# Altium PCB HSS_2026_PCB.PcbDoc (part 1 of 3)
Units mil, origin at the board's own origin, x right, y up, seen from the top; angles counter-clockwise.
Board outline 3937.01 x 3937.01 mil, 4 copper layers (SIG_1/POW, GND, PWR, SIG_2/GND), stack 22.334 mil thick; 289 components, 169 nets, 827 pads, 358 vias.
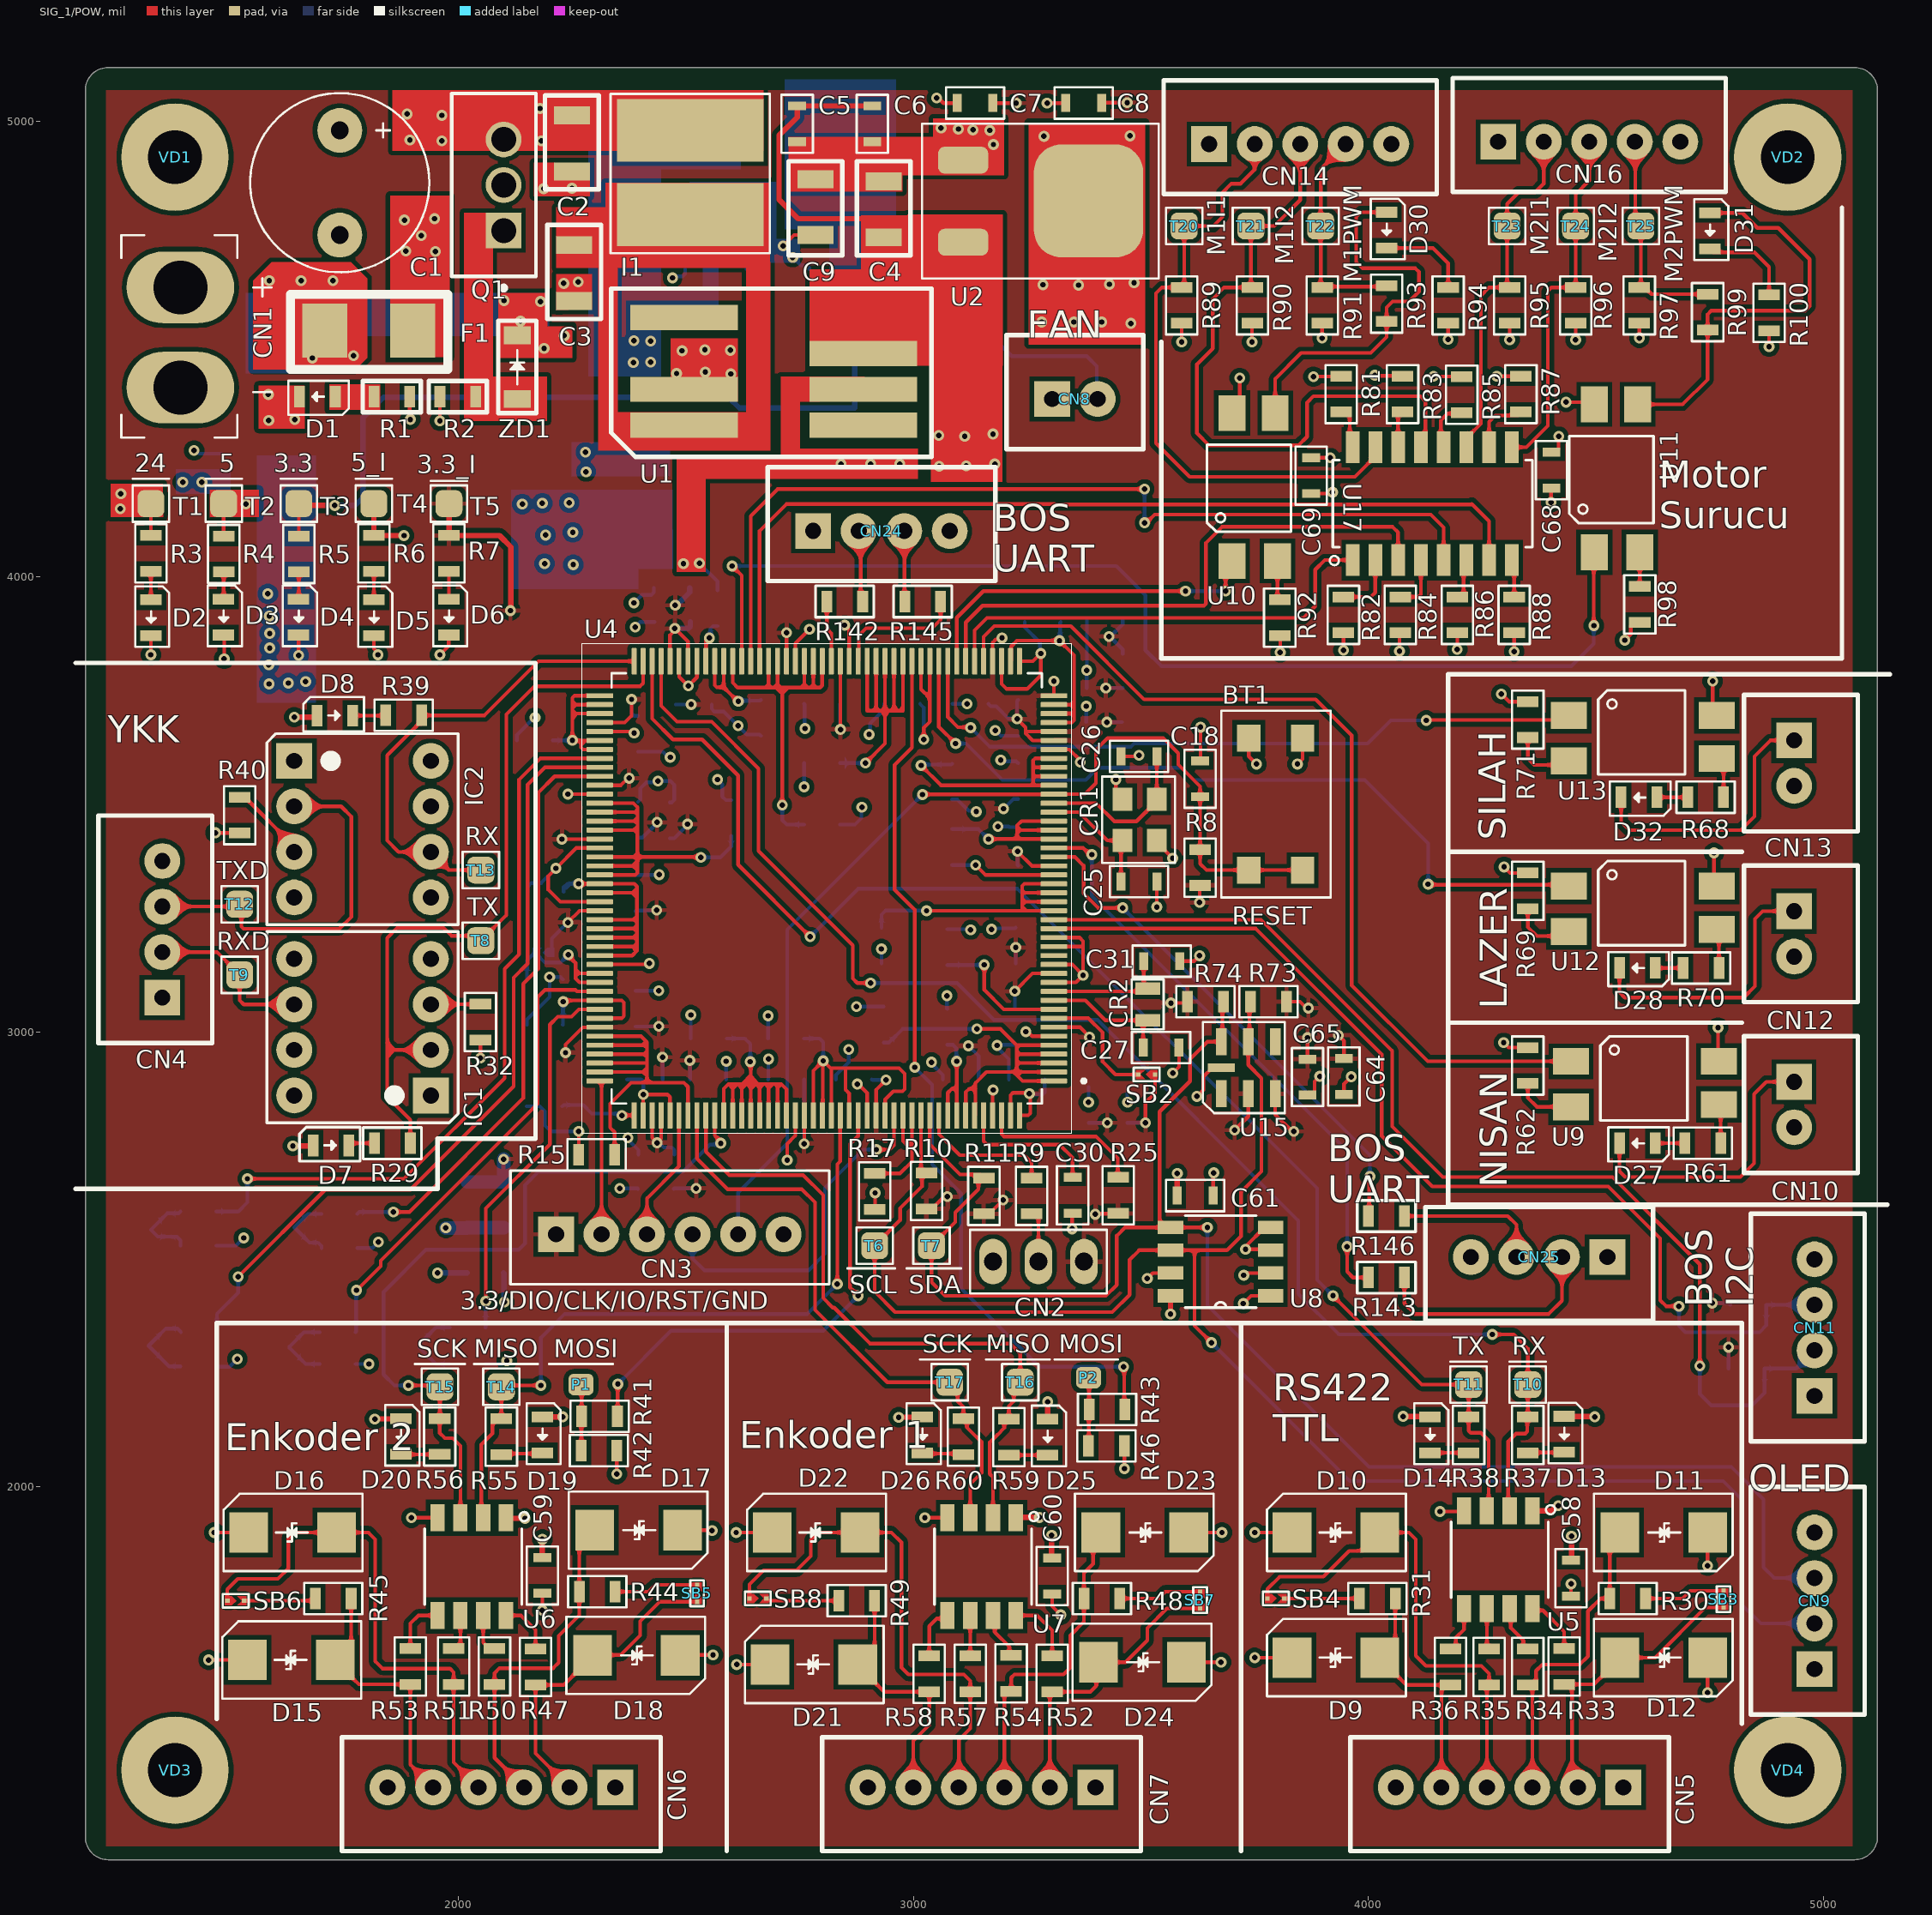
[diagram p0: SIG_1/POW view]
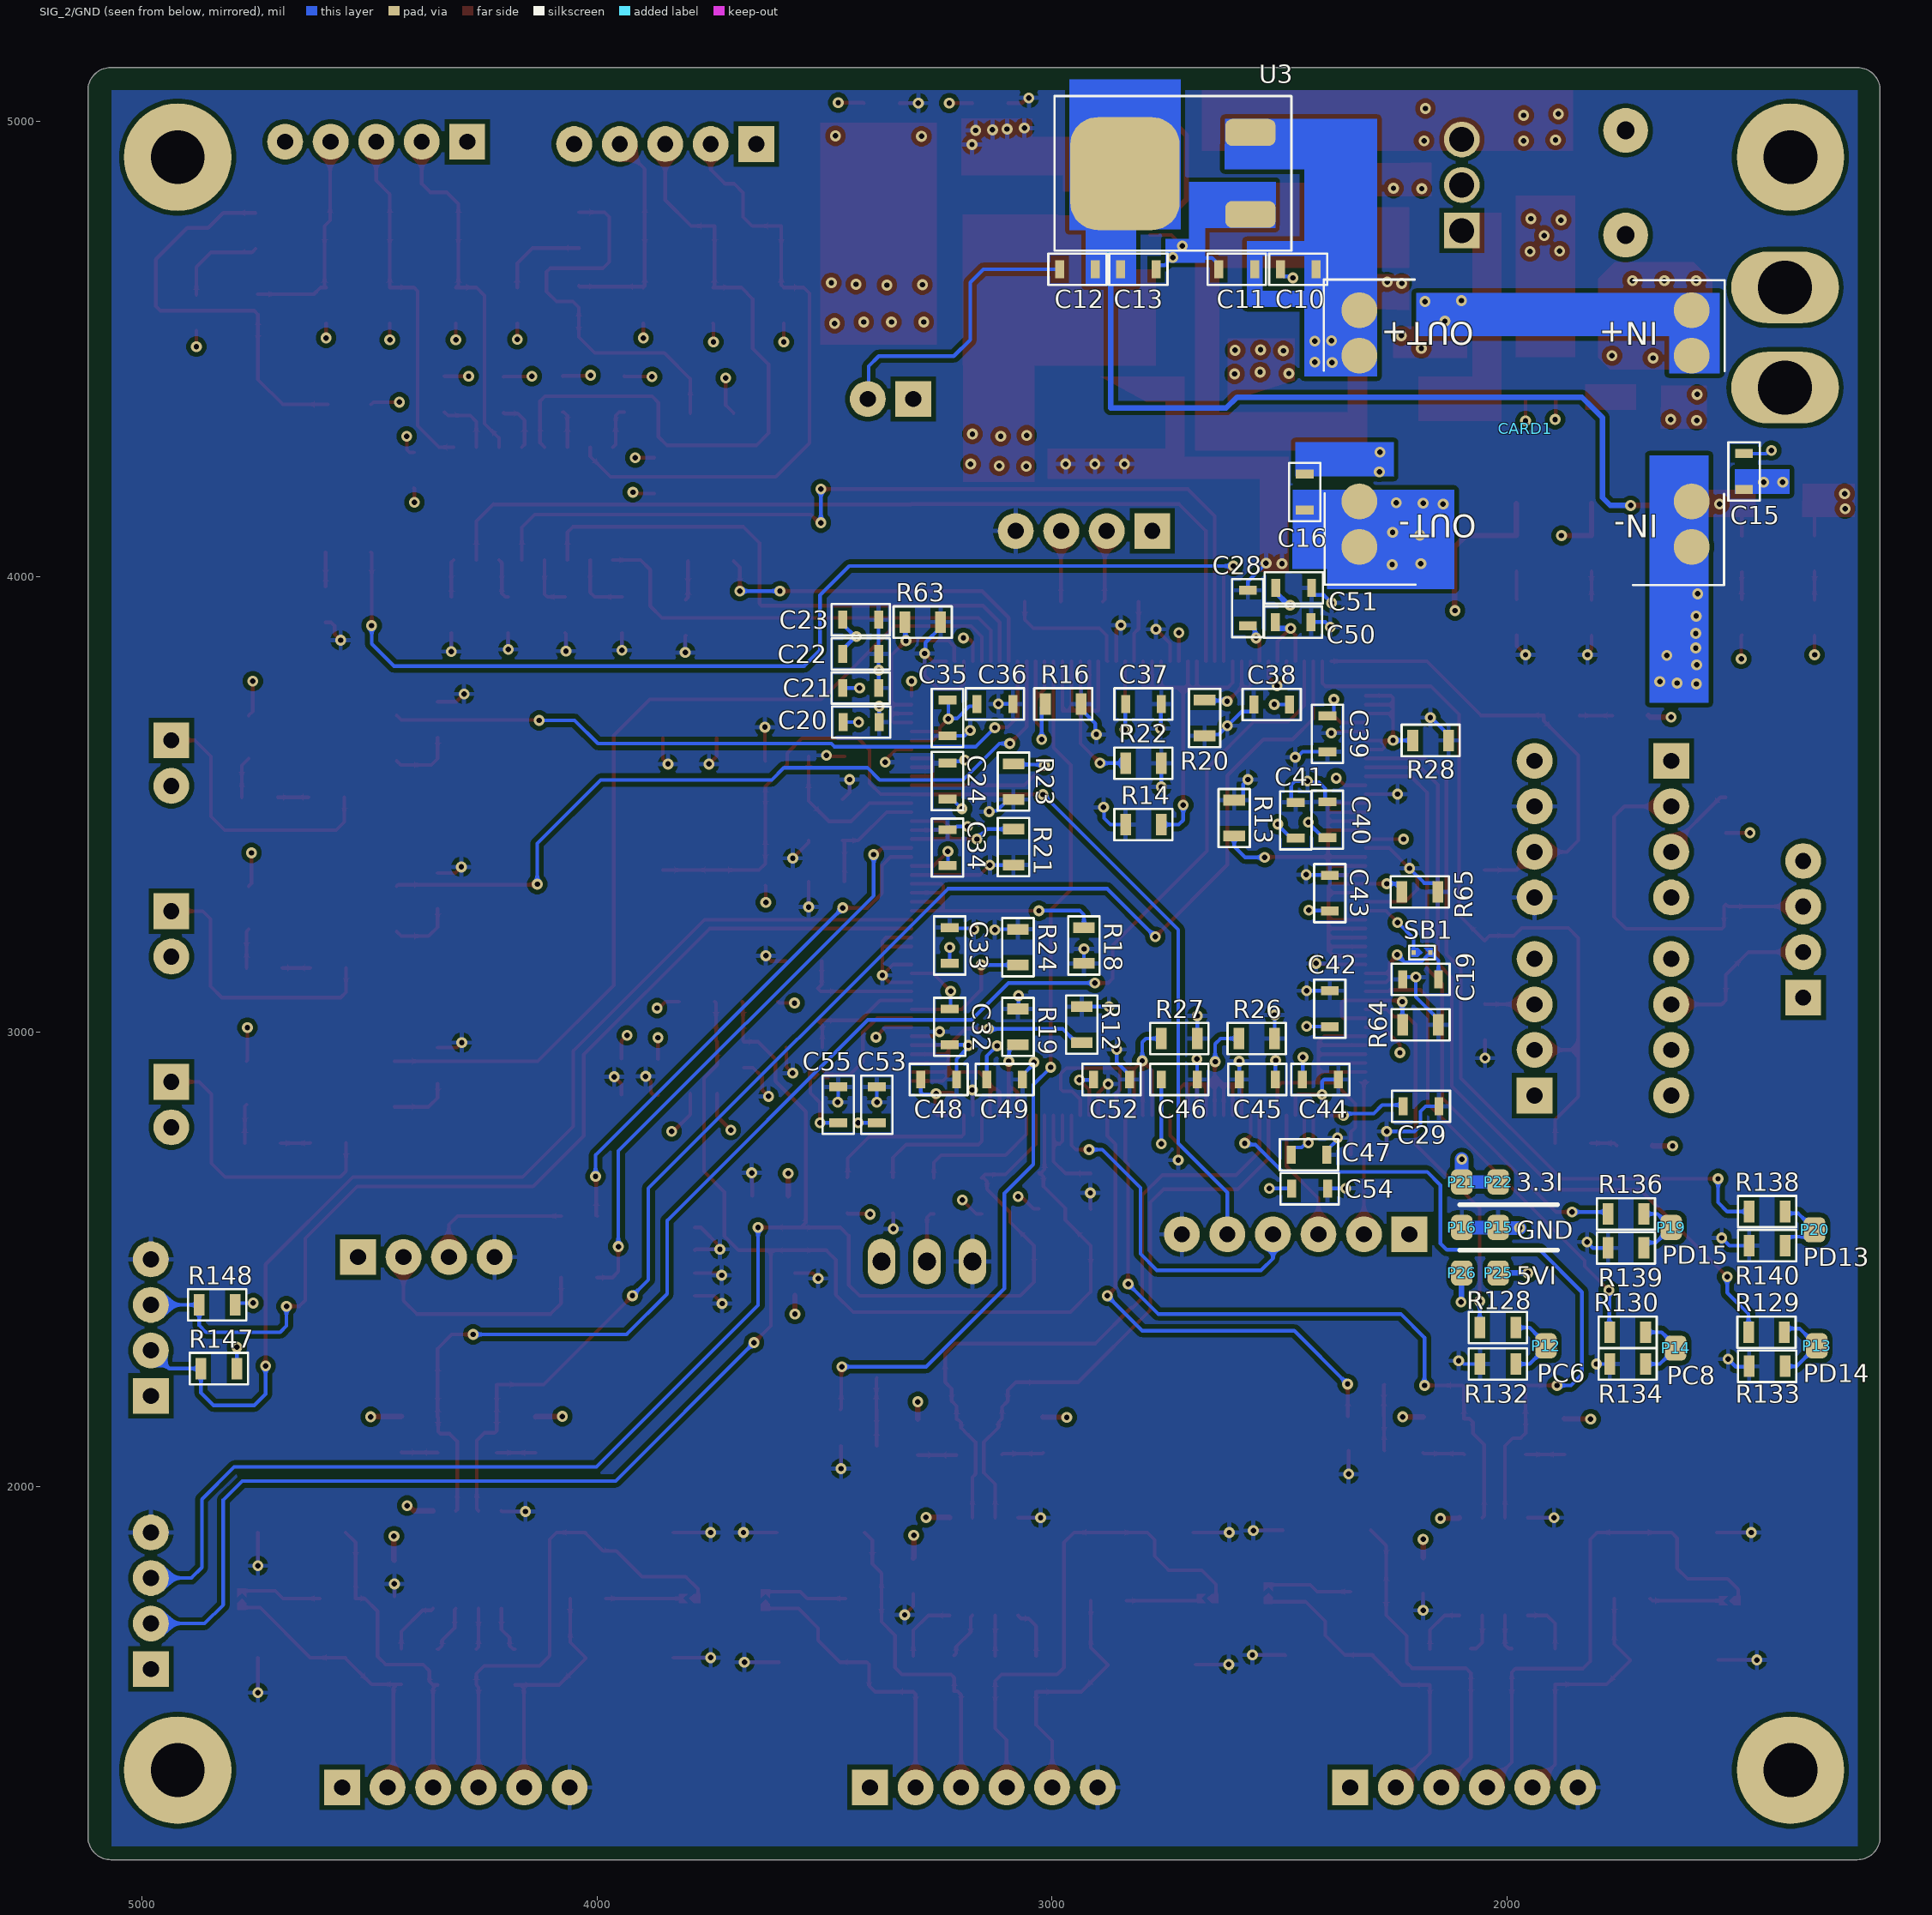
[diagram p1: SIG_2/GND view, seen from below]
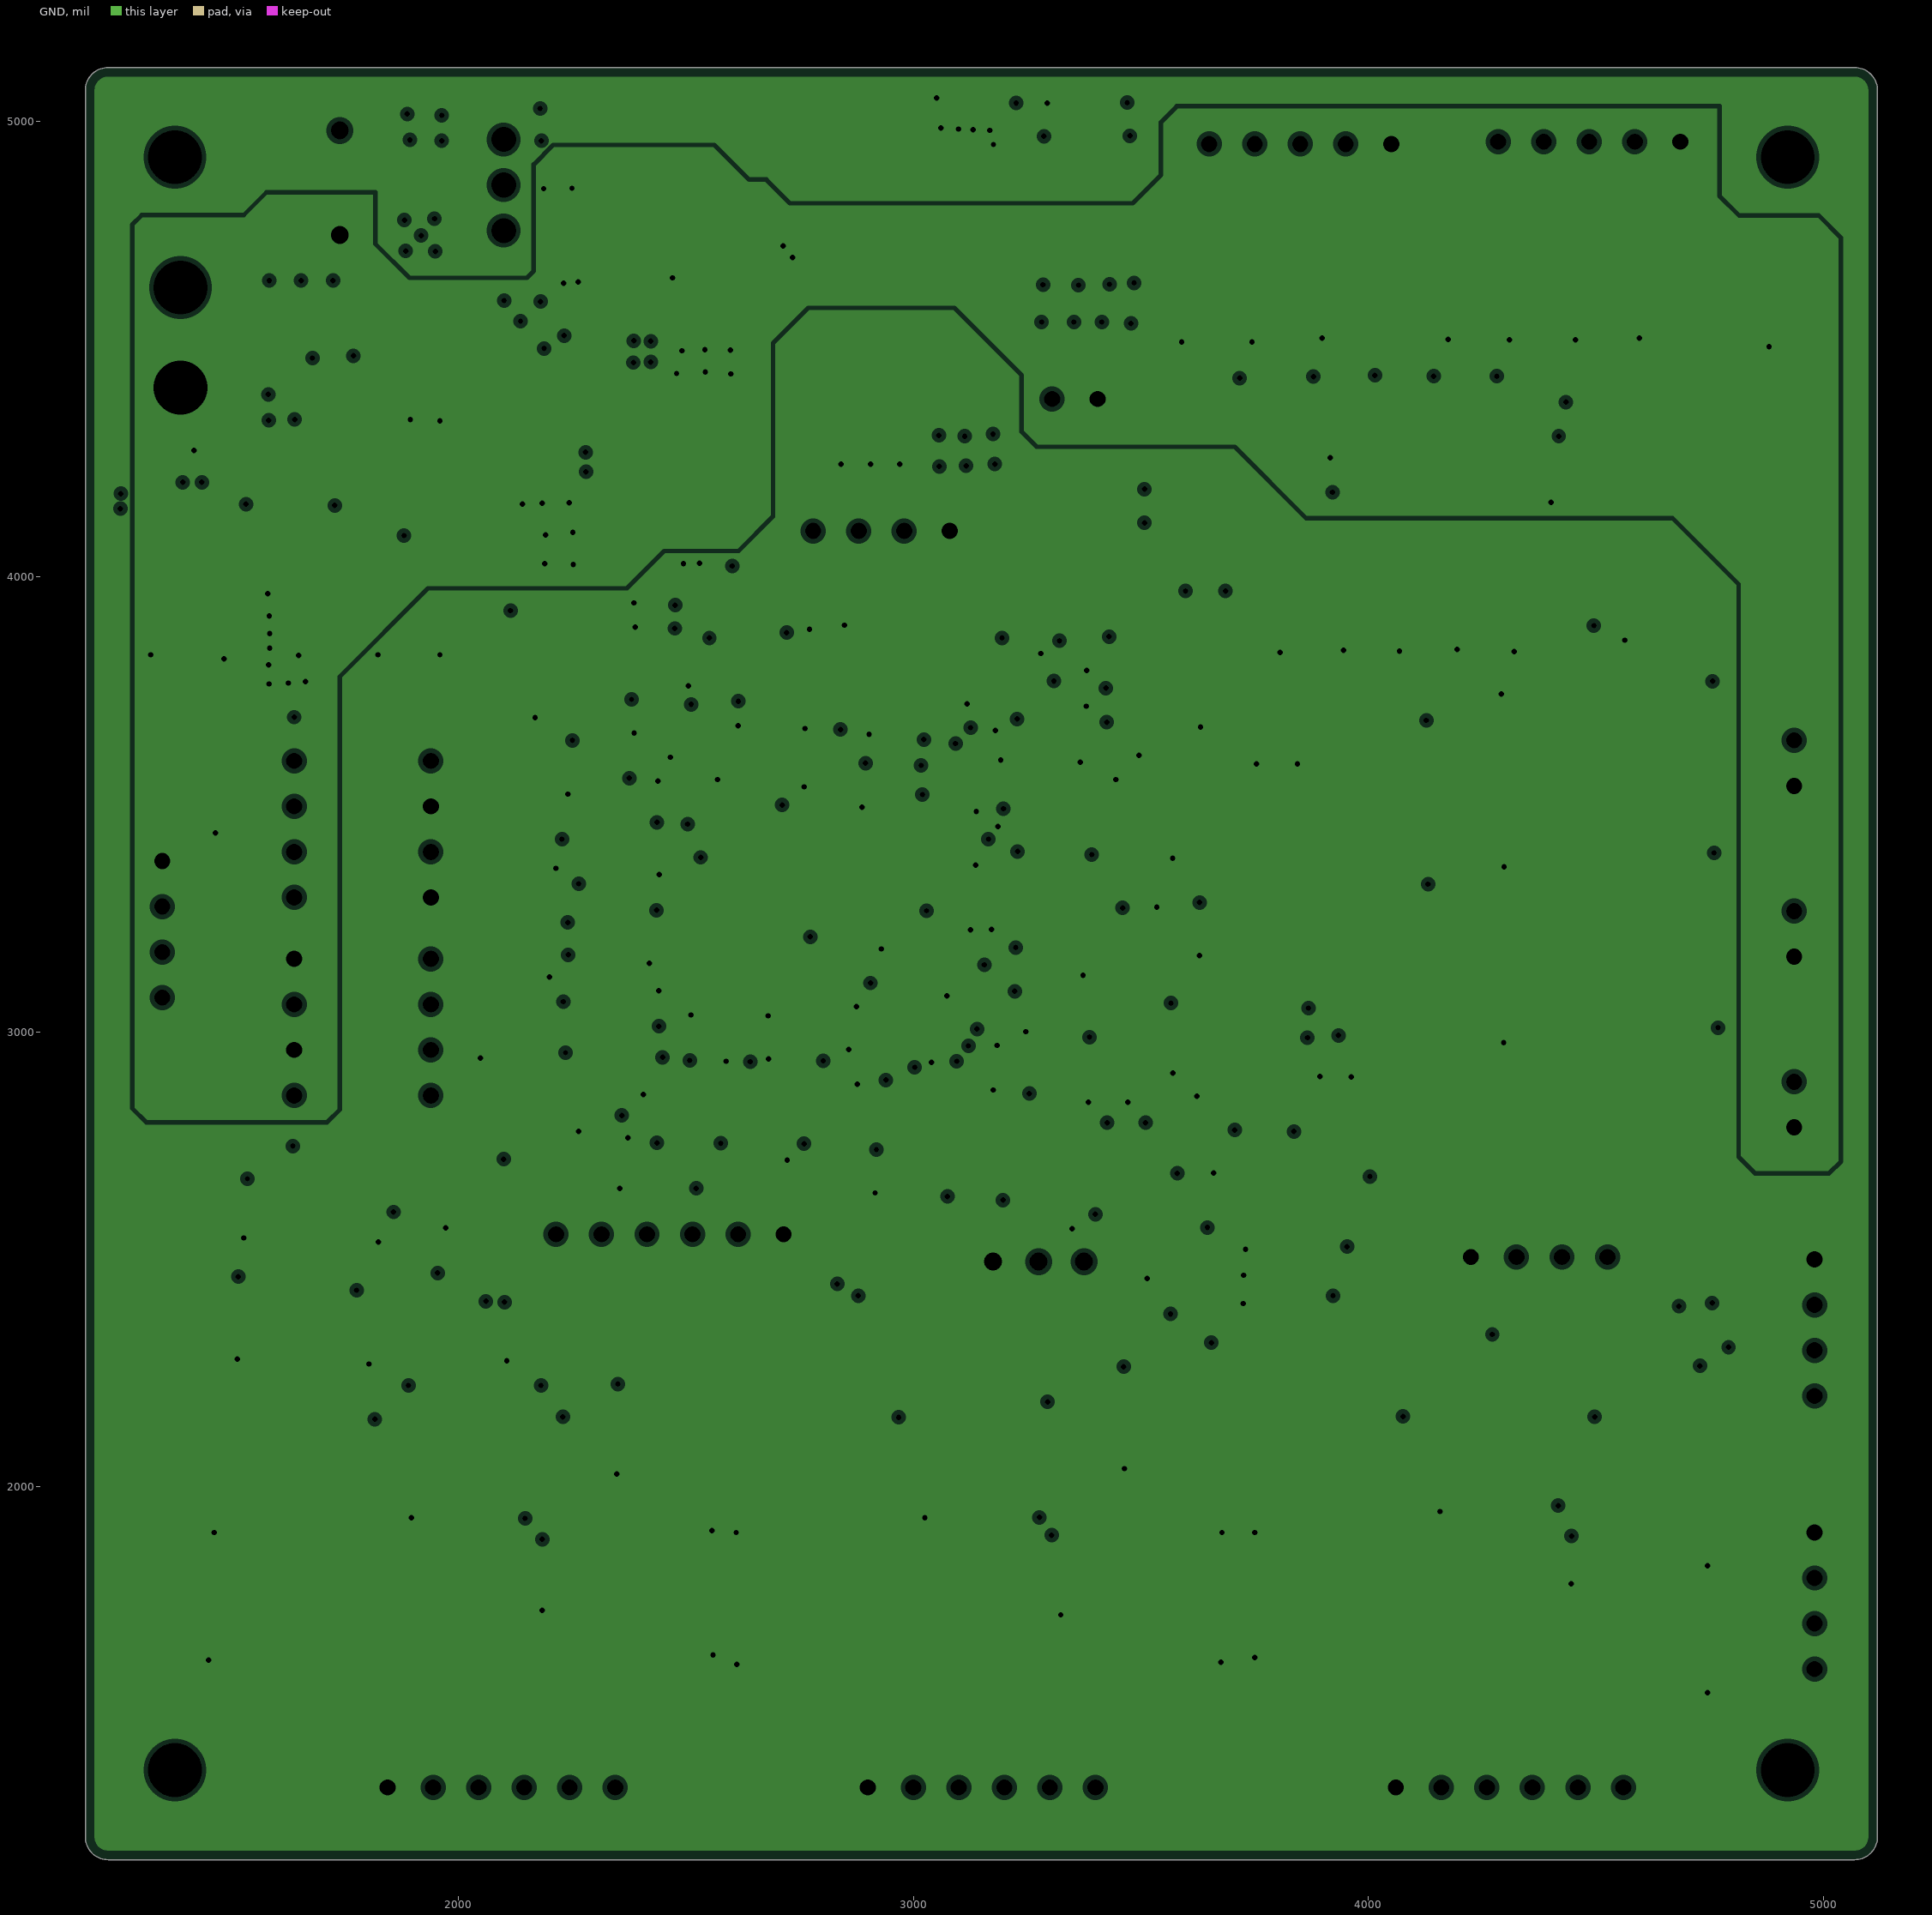
[diagram p2: GND, clearances drawn from the general rule]
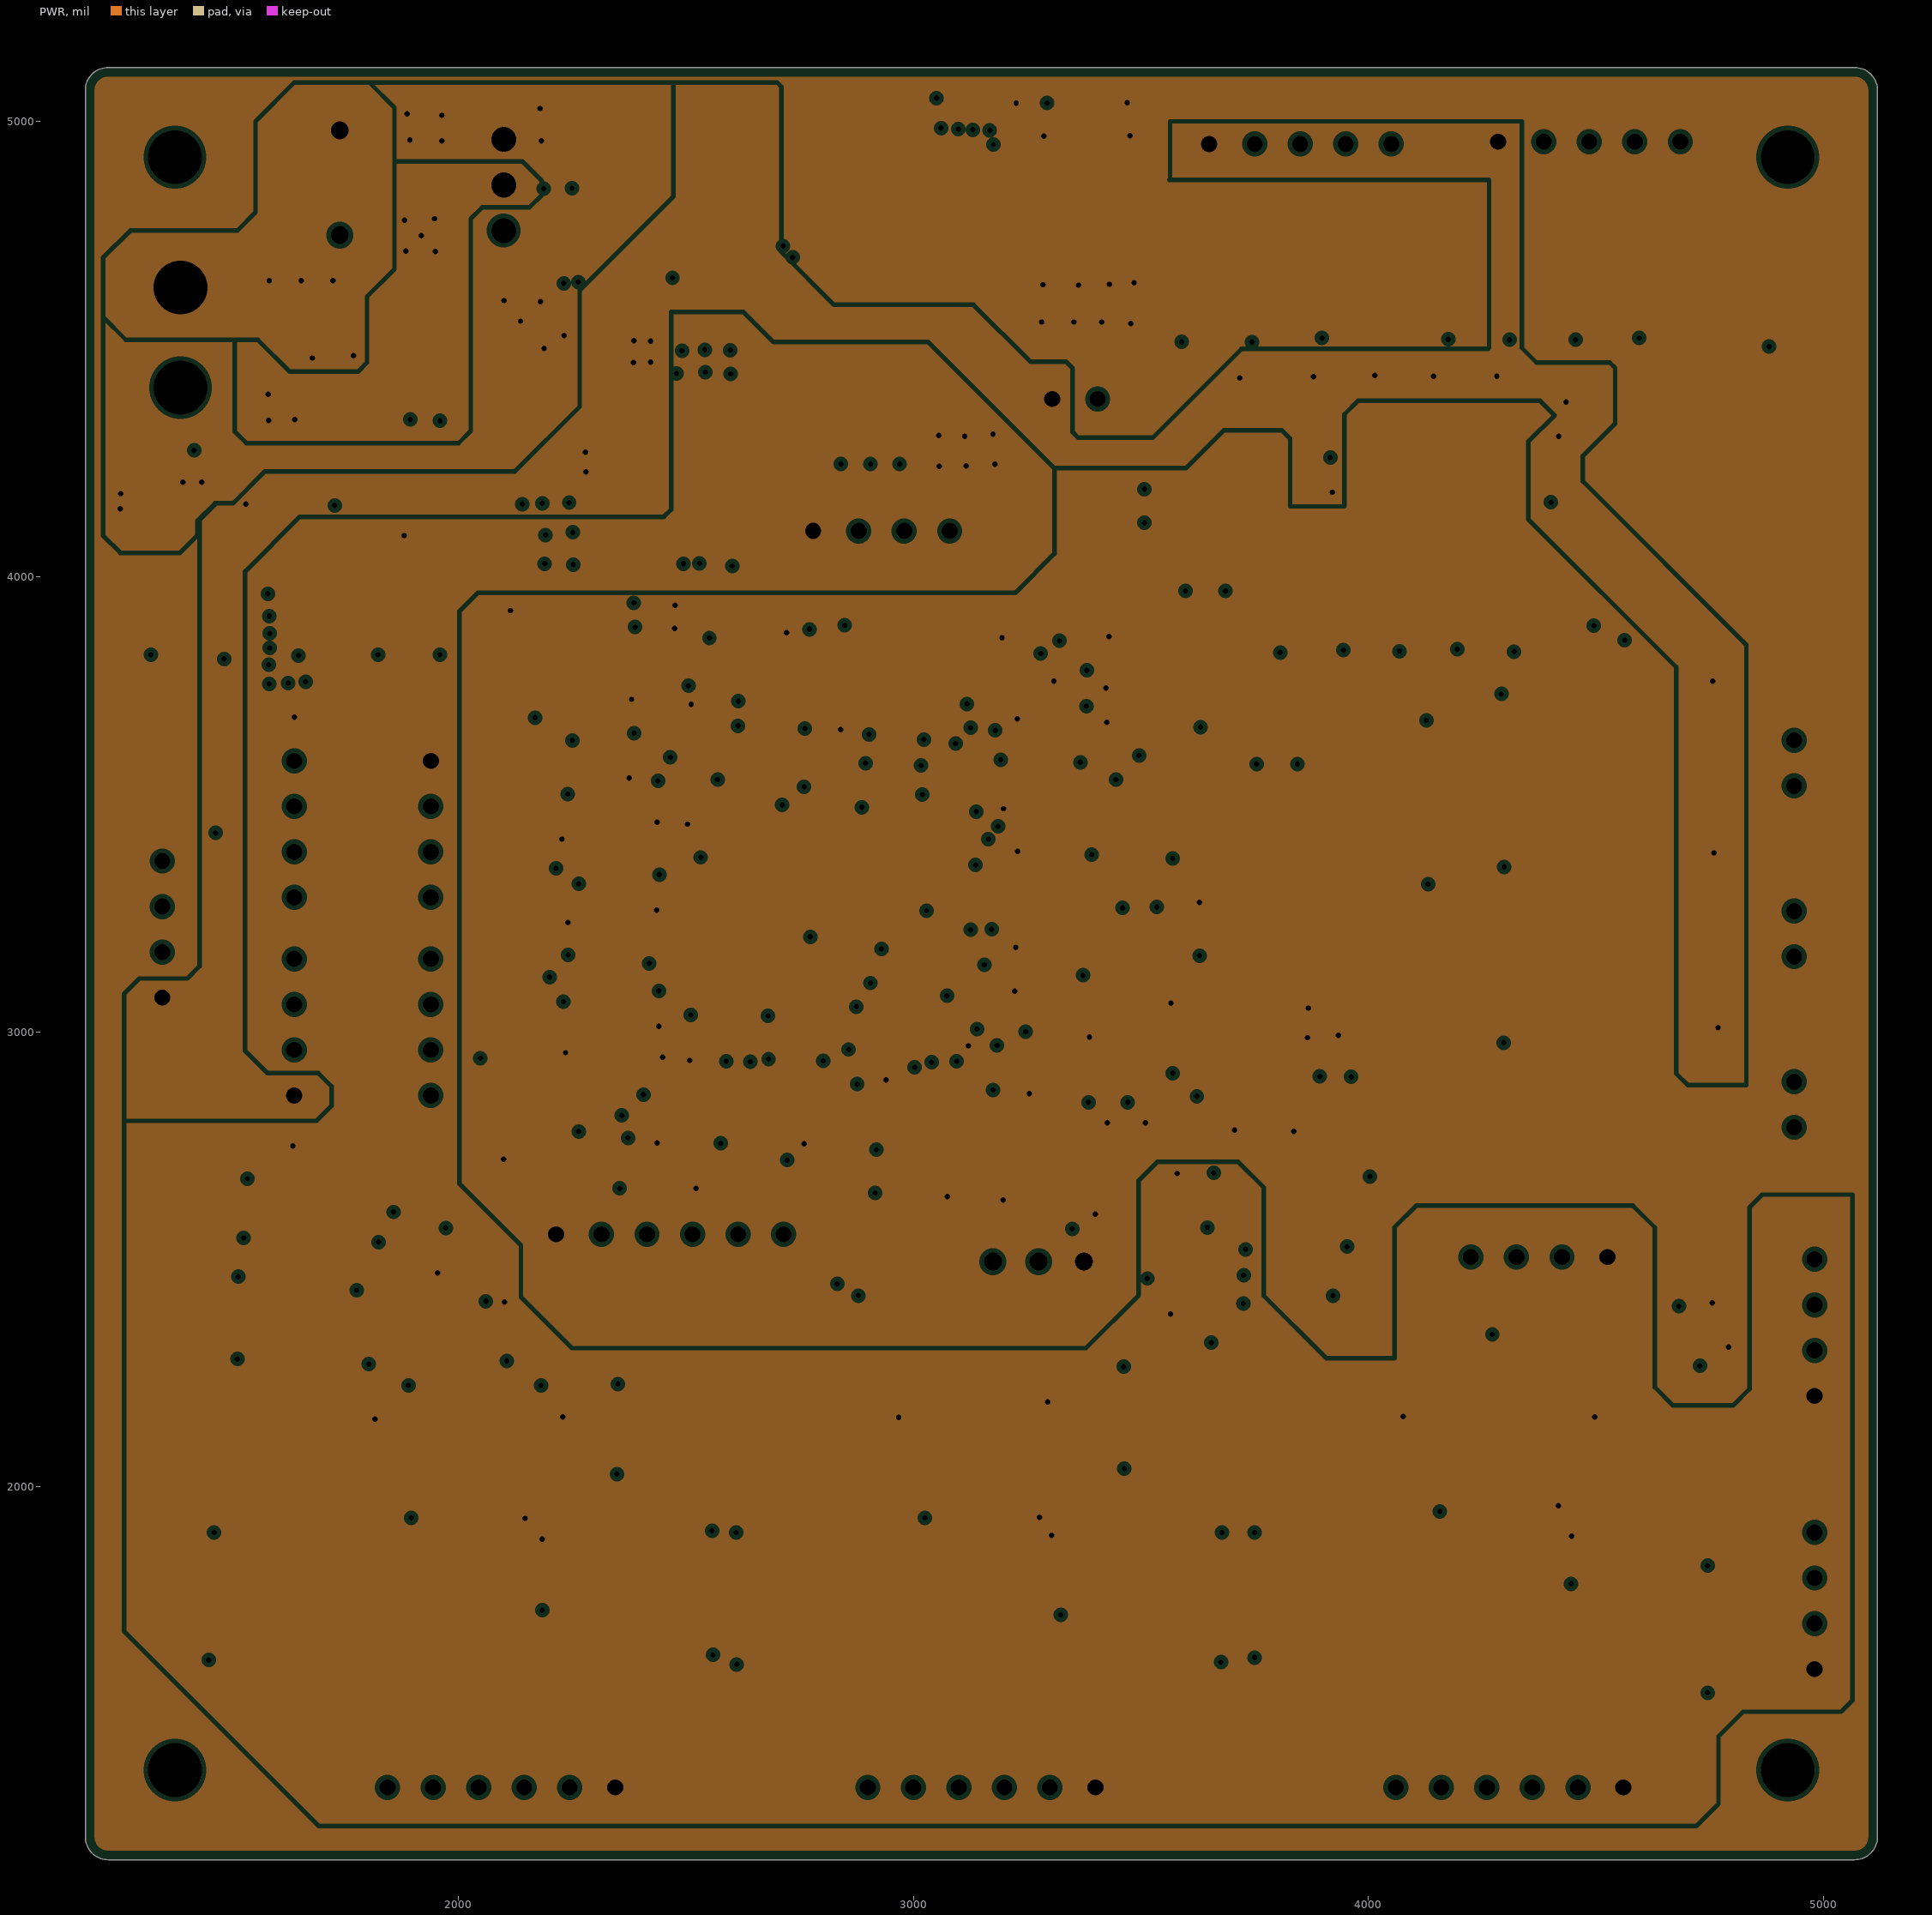
[diagram p3: PWR, clearances drawn from the general rule]
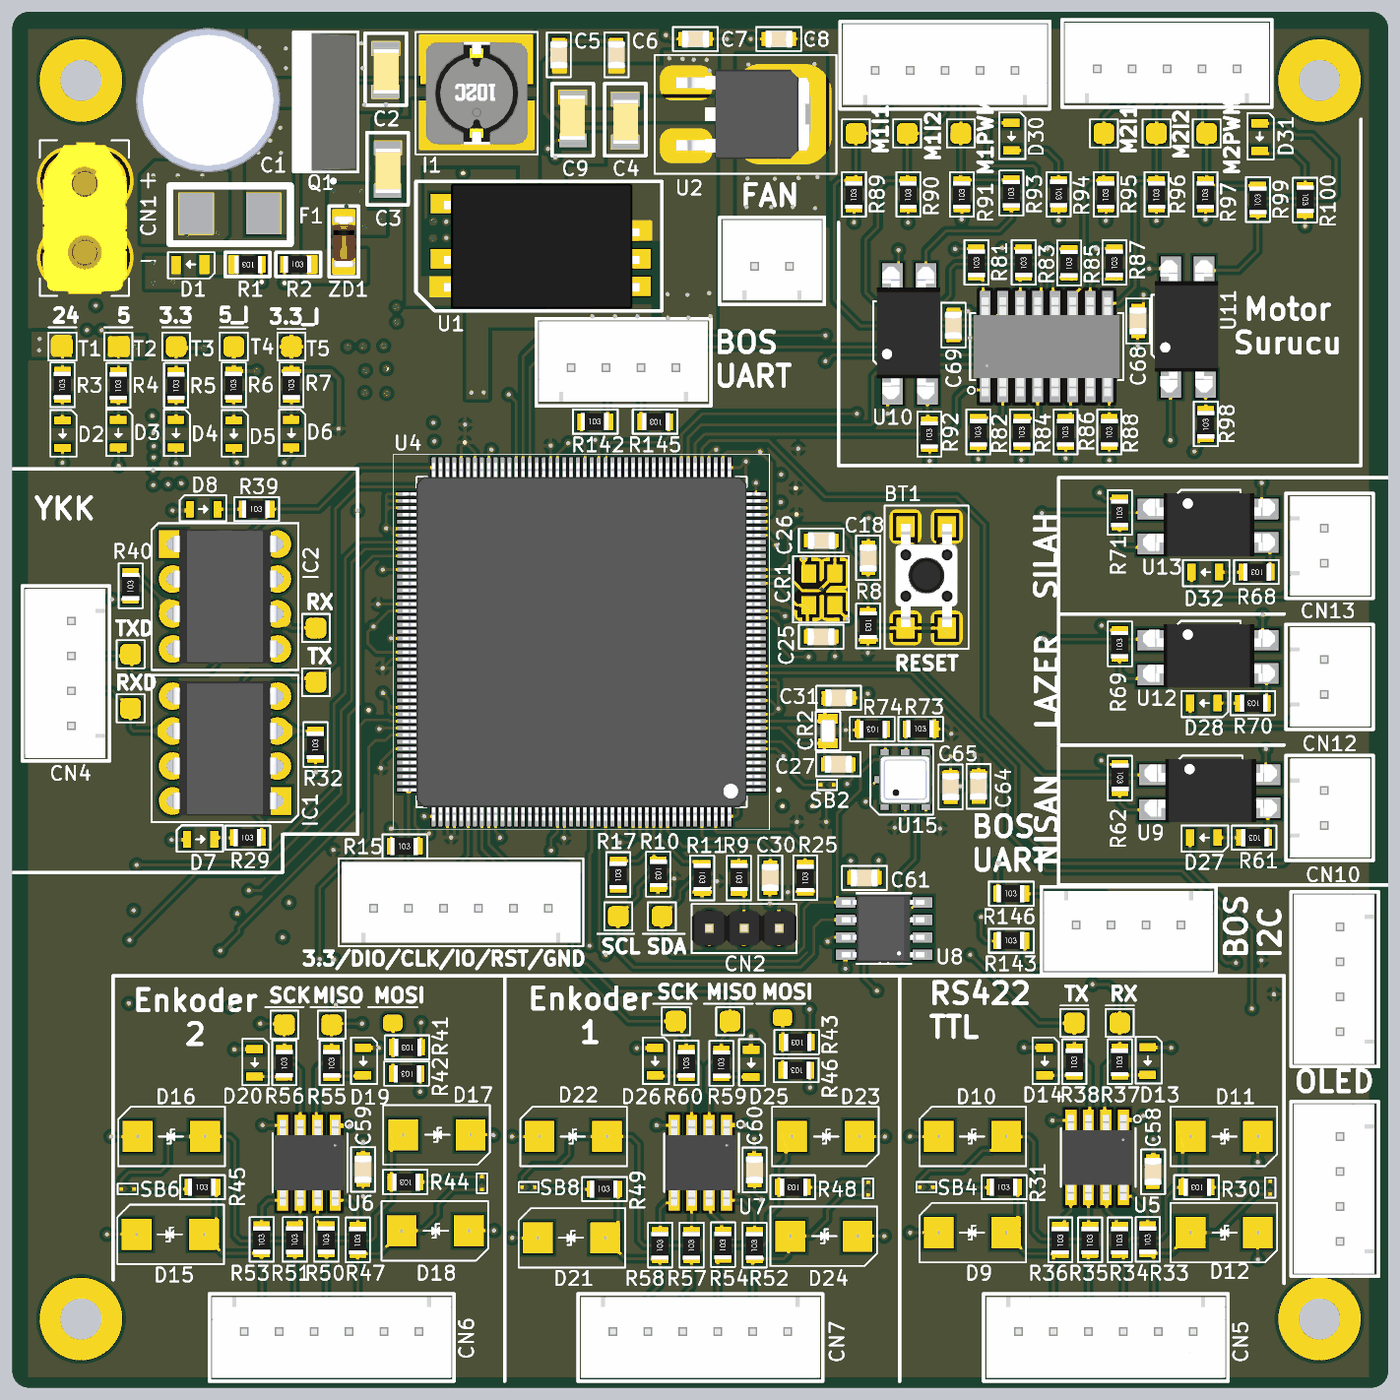
[diagram p6: 3D render of the assembled board from above, using the file's embedded part models]
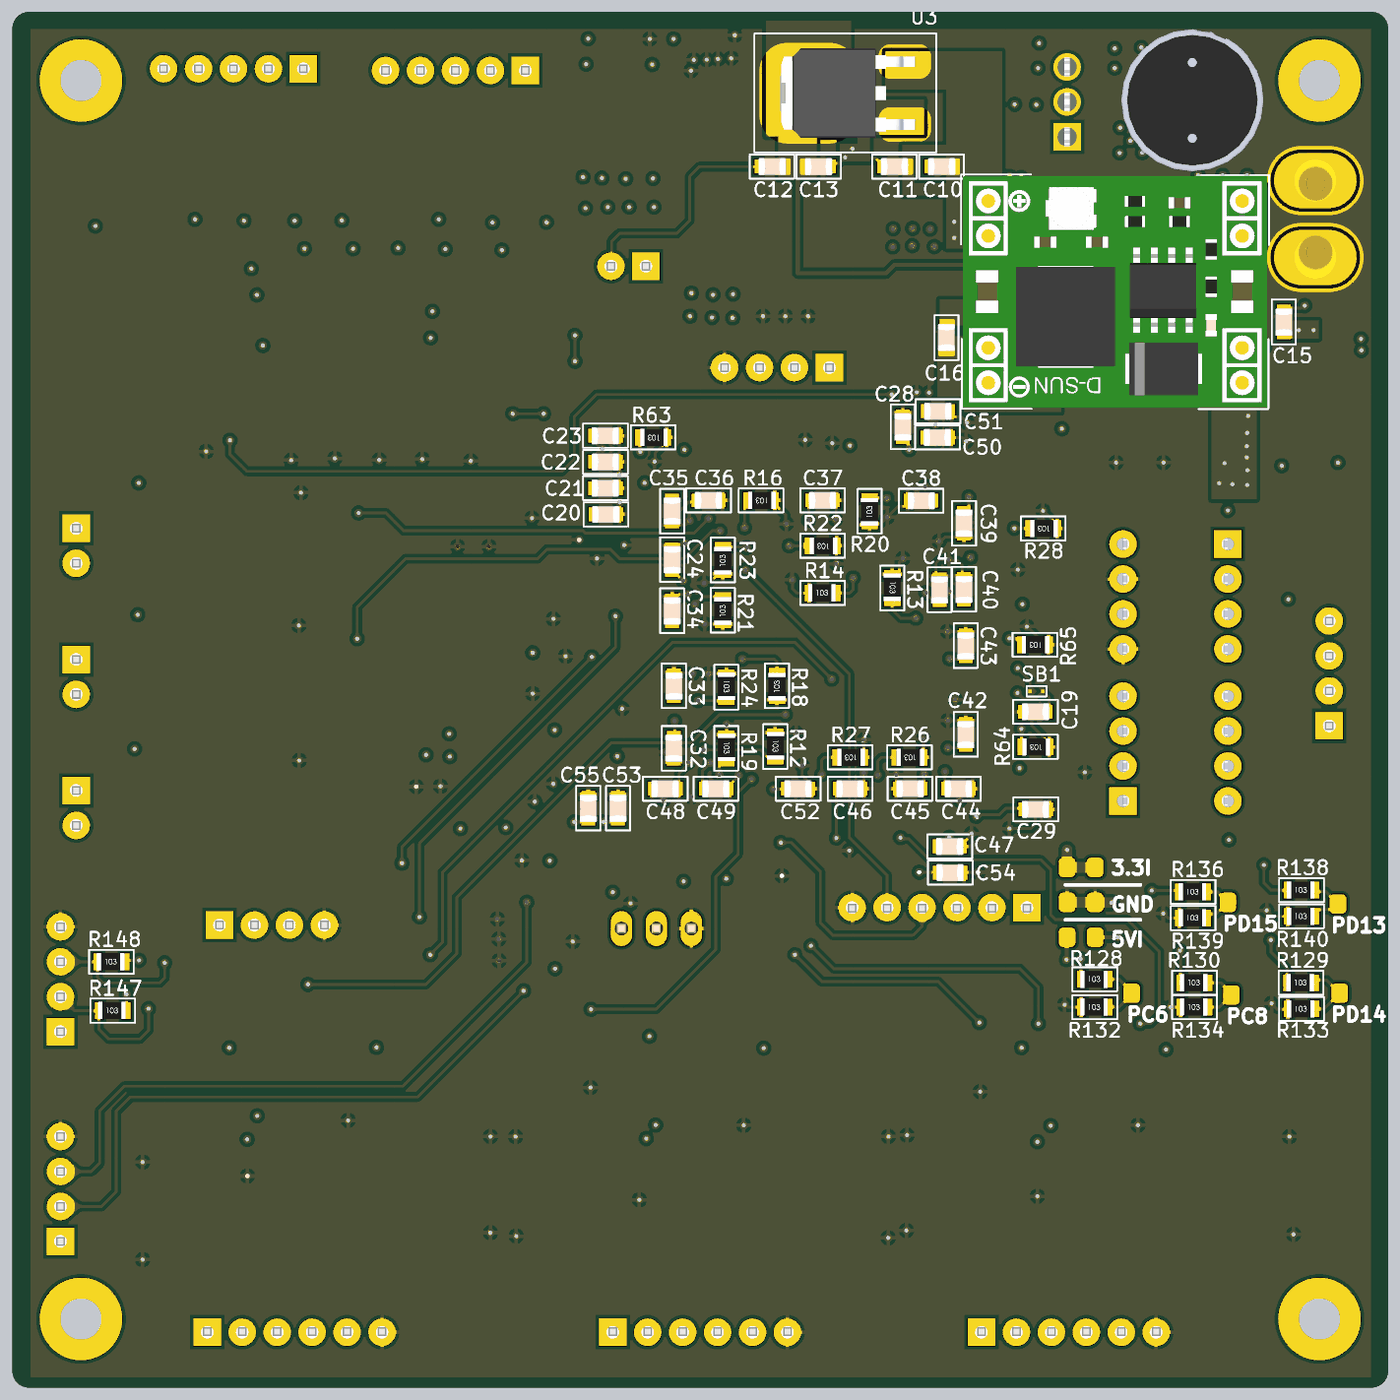
[diagram p7: 3D render of the assembled board from below, using the file's embedded part models]

## Layer stack, top to bottom
Top Solder: solder mask 0.4, Solder Resist, Dk 3.5
SIG_1/POW: signal copper 1.378
Dielectric 2: prepreg 2.8, PP-006, Dk 4.1
GND: plane copper 0.689, net (Multiple Nets)
Dielectric 1: dielectric 12.6, FR-4, Dk 4.8
PWR: plane copper 0.689, net (Multiple Nets)
Dielectric 3: prepreg 2.8, PP-006, Dk 4.1
SIG_2/GND: signal copper 1.378
Bottom Solder: solder mask 0.4, Solder Resist, Dk 3.5

## Board outline
1181.1,1231.1 1181.1,5068.11 cw(c1231.1,5068.11) 1231.1,5118.11 5068.11,5118.11 cw(c5068.11,5068.11) 5118.11,5068.11 5118.11,1231.1 cw(c5068.11,1231.1) 5068.11,1181.1 1231.1,1181.1 cw(c1231.1,1231.1)

## Design rules (kind name [scope] priority, off if disabled: settings)
Clearance [All] p1: gap=8 ignorepadtopadclearanceinfootprint=FALSE
Creepage [All] p1: checkdistance=10 applytopolygonpour=TRUE
HoleSize [All] p1: absolutevalues=TRUE maxlimit=200 minlimit=1 maxpercent=80.000 minpercent=20.000
HoleToHoleClearance [All] p1: gap=8 allowstackedmicrovias=TRUE
MinimumSolderMaskSliver [All] p1: minsoldermaskwidth=6
PlaneClearance [All] p1: clearance=10
PlaneConnect [All] p1: planeconnectstyle=Relief reliefexpansion=20 reliefentries=4 reliefconductorwidth=10 reliefairgap=10
PolygonConnect [All] p1: connectstyle=Relief reliefconductorwidth=10 reliefentries=4 polygonreliefangle="90 Angle" airgapwidth=10
RoutingVias [All] p1: holewidth=28 width=50 viastyle="Through Hole" minholewidth=28 minwidth=50 maxholewidth=150 maxwidth=200
SilkToSilkClearance [All] p1: silktosilkclearance=8
SilkToSolderMaskClearance [IsPad] p1: minsilkscreentomaskgap=8 clearancetoexposedcopper=TRUE
SolderMaskExpansion [All] p1: expansion=4 istentingtop=FALSE
UnConnectedPin [All] p1:
Width [All] p1: maxlimit=100 minlimit=8 preferedwidth=8 minimp=50.000000 maximp=50.000000 favimp=50.000000
23 further rules are at their usual default settings.

## Classes and differential pairs
component class "STM32 Sematik": BT1 C18 C19 C20 C21 C22 C23 C24 C25 C26 C27 C28 C29 C30 C31 C32 C33 C34 C35 C36 C37 C38 C39 C40 C41 C42 C43 C44 C45 C46 C47 C48 C49 C50 C51 C52 C53 C54 C55 CN2 CN3 CR1 CR2 R8 R9 R10 R11 R12 R13 R14 R15 R16 R17 R18 R19 R20 R21 R22 R23 R24 R25 R26 R27 R28 R63 R64 R65 SB1 SB2 T6 T7 U4
component class "Power Sematik": C1 C2 C3 C4 C5 C6 C7 C8 C9 C10 C11 C12 C13 C15 C16 CARD1 CN1 D1 D2 D3 D4 D5 D6 F1 I1 Q1 R1 R2 R3 R4 R5 R6 R7 T1 T2 T3 T4 T5 U1 U2 U3 ZD1
component class "Harici Moduller": CN8 CN9 CN10 CN12 CN13 D27 D28 D32 R61 R62 R68 R69 R70 R71 U9 U12 U13
component class "Dahili Moduller 3": CN11 CN24 CN25 P12 P13 P14 P15 P16 P19 P20 P21 P22 P25 P26 R128 R129 R130 R132 R133 R134 R136 R138 R139 R140 R142 R143 R145 R146 R147 R148 VD1 VD2 VD3 VD4
component class "Dahili Moduller 2": C64 C65 C68 C69 CN14 CN16 D30 D31 R73 R74 R81 R82 R83 R84 R85 R86 R87 R88 R89 R90 R91 R92 R93 R94 R95 R96 R97 R98 R99 R100 T20 T21 T22 T23 T24 T25 U10 U11 U15 U17
component class "Dahili Moduller 1": C58 C59 C60 C61 CN4 CN5 CN6 CN7 D7 D8 D9 D10 D11 D12 D13 D14 D15 D16 D17 D18 D19 D20 D21 D22 D23 D24 D25 D26 IC1 IC2 P1 P2 R29 R30 R31 R32 R33 R34 R35 R36 R37 R38 R39 R40 R41 R42 R43 R44 R45 R46 R47 R48 R49 R50 R51 R52 R53 R54 R55 R56 R57 R58 R59 R60 SB3 SB4 SB5 SB6 SB7 SB8 T8 T9 T10 T11 T12 T13 T14 T15 T16 T17 U5 U6 U7 U8

## Components (designator, comment, footprint, x,y, rotation, side; value= is the part's Value field where it differs from the comment)
BT1 "5_mm_Buton" 5mm_buton 3736.89,3405 r90 top
C1 "CAP_Elec" CAP_Elec 1735,4870 r270 top
C2 "10uF/50V" 1206_Kapasitör 2250,4870 r90 top
C3 "2.2uF/50V" 1206_Kapasitör 2255,4585.31 r90 top
C4 "10uF" 1206_Kapasitör 2935,4725.31 r90 top
C5 "10uF" "0805 Kapasıtor" 2745,4955 r90 top
C6 "1nF" "0805 Kapasıtor" 2910,4955 r90 top
C7 "10uF" "0805 Kapasıtor" 3096.26,5040 r0 top
C8 "1nF" "0805 Kapasıtor" 3335,5040 r0 top
C9 "330pF/3kV" 1206_Kapasitör 2785,4892.72 r270 top
C10 "10uF" "0805 Kapasıtor" 2498.74,4675 r180 bottom
C11 "1nF" "0805 Kapasıtor" 2633.74,4675 r180 bottom
C12 "10uF" "0805 Kapasıtor" 2983.74,4675 r180 bottom
C13 "1nF" "0805 Kapasıtor" 2771.26,4675 r0 bottom
C15 "10uF" "0805 Kapasıtor" 1480,4270 r270 bottom
C16 "10uF" "0805 Kapasıtor" 2445,4146.26 r90 bottom
C18 "100nF" "0805 Kapasıtor" 3630,3595 r270 top
C19 "1uF" "0805 Kapasıtor" 2230,3115 r180 bottom
C20 "100nF" "0805 Kapasıtor" 3380,3680 r0 bottom
C21 "4.7uF" "0805 Kapasıtor" 3381.26,3755 r0 bottom
C22 "100nF" "0805 Kapasıtor" 3381.26,3830 r0 bottom
C23 "4.7uF" "0805 Kapasıtor" 3381.26,3905 r0 bottom
C24 "100nF" "0805 Kapasıtor" 3230,3590 r270 bottom
C25 "27pF" "0805 Kapasıtor" 3535,3330 r180 top
C26 "27pF" "0805 Kapasıtor" 3456.26,3605 r0 top
C27 "15pF" "0805 Kapasıtor" 3505,2965 r0 top
C28 "2.2uF" "0805 Kapasıtor" 2570,3970 r270 bottom
C29 "2.2uF" "0805 Kapasıtor" 2150.26,2836 r0 bottom
C30 "2.2uF" "0805 Kapasıtor" 3350,2601.26 r90 top
C31 "15pF" "0805 Kapasıtor" 3506.26,3155 r0 top
C32 "100nF" "0805 Kapasıtor" 3225,2971.26 r90 bottom
C33 "100nF" "0805 Kapasıtor" 3225,3228.74 r270 bottom
C34 "100nF" "0805 Kapasıtor" 3230,3443.74 r270 bottom
C35 "100nF" "0805 Kapasıtor" 3230,3650 r90 bottom
C36 "100nF" "0805 Kapasıtor" 3086.26,3720 r0 bottom
C37 "100nF" "0805 Kapasıtor" 2760,3720 r0 bottom
C38 "100nF" "0805 Kapasıtor" 2557,3719 r180 bottom
C39 "100nF" "0805 Kapasıtor" 2395,3615 r90 bottom
C40 "100nF" "0805 Kapasıtor" 2395,3505 r270 bottom
C41 "4.7uF" "0805 Kapasıtor" 2465,3503.74 r270 bottom
C42 "100nF" "0805 Kapasıtor" 2390,3090 r270 bottom
C43 "100nF" "0805 Kapasıtor" 2390,3343.74 r270 bottom
C44 "100nF" "0805 Kapasıtor" 2371.26,2895 r0 bottom
C45 "100nF" "0805 Kapasıtor" 2588.74,2895 r180 bottom
C46 "100nF" "0805 Kapasıtor" 2681.26,2895 r0 bottom
C47 "100nF" "0805 Kapasıtor" 2396.26,2730 r0 bottom
C48 "100nF" "0805 Kapasıtor" 3210,2895 r0 bottom
C49 "100nF" "0805 Kapasıtor" 3065,2895 r0 bottom
C50 "100nF" "0805 Kapasıtor" 2431.26,3900 r0 bottom
C51 "4.7uF" "0805 Kapasıtor" 2430,3975 r0 bottom
C52 "100nF" "0805 Kapasıtor" 2830,2895 r0 bottom
C53 "4.7uF" "0805 Kapasıtor" 3385,2878.74 r270 bottom
C54 "100nF" "0805 Kapasıtor" 2395,2655 r0 bottom
C55 "4.7uF" "0805 Kapasıtor" 3470,2878.74 r270 bottom
C58 "0.1uF" "0805 Kapasıtor" 4445,1760 r90 top
C59 "0.1uF" "0805 Kapasıtor" 2185,1766.26 r90 top
C60 "0.1uF" "0805 Kapasıtor" 3305,1765 r90 top
C61 "100nF" "0805 Kapasıtor" 3658.74,2640 r180 top
C64 "100nF" "0805 Kapasıtor" 3946,2862.26 r90 top
C65 "100nF" "0805 Kapasıtor" 3866,2861 r90 top
C68 "100nF" "0805 Kapasıtor" 4402,4194 r90 top
C69 "10uF" "0805 Kapasıtor" 3874,4261 r270 top
CARD1 "MP1584EN" MP1584 1960,4325 r0 bottom
CN1 "XT30" XT30 1390,4525 r0 top
CN2 "3_Pin_Header" 3_PIN_HEADER 3375,2495 r180 top
CN3 "6_Pin_JST_Male" 6_Pin_JST_Male 2215,2555 r0 top
CN4 "4_Pin_JST_Male" 4_Pin_JST_Male 1350,3075 r90 top
CN5 "6_Pin_JST_Male" 6_Pin_JST_Male 4560,1340 r180 top
CN6 "6_Pin_JST_Male" 6_Pin_JST_Male 2345,1340 r180 top
CN7 "6_Pin_JST_Male" 6_Pin_JST_Male 3400,1340 r180 top
CN8 "2_Pin_JST_Male" 2_Pin_JST_Male 3305,4390 r0 top
CN9 "4_Pin_JST_Male" 4_Pin_JST_Male 4980,1600 r90 top
CN10 "2_Pin_JST_Male" 2_Pin_JST_Male 4935,2890 r270 top
CN11 "4_Pin_JST_Male" 4_Pin_JST_Male 4980,2200 r90 top
CN12 "2_Pin_JST_Male" 2_Pin_JST_Male 4935,3265 r270 top
CN13 "2_Pin_JST_Male" 2_Pin_JST_Male 4935,3640 r270 top
CN14 "5_Pin_JST_Male" 5_Pin_JST_Male 3650,4950 r0 top
CN16 "5_Pin_JST_Male" 5_Pin_JST_Male 4285,4955 r0 top
CN24 "4_Pin_JST_Male" 4_Pin_JST_Male 2780,4100 r0 top
CN25 "4_Pin_JST_Male" 4_Pin_JST_Male 4525,2505 r180 top
CR1 "RH100" RH100 3534.8,3510.55 r270 top
CR2 "RT2012" RT2012 3515,3090 r270 top
D1 "Kırmızı" "0805 LED" 1730,4395 r180 top
D2 "Kırmızı" "0805 LED" 1325.47,3948.58 r270 top
D3 "Sarı" "0805 LED" 1485,3950 r270 top
D4 "Yeşil" "0805 LED" 1650,3950 r270 top
D5 "Sarı" "0805 LED" 1815.47,3948.58 r270 top
D6 "Yeşil" "0805 LED" 1980,3950 r270 top
D7 "0805 LED" "0805 LED" 1681.42,2750.47 r0 top
D8 "0805 LED" "0805 LED" 1690,3695 r0 top
D9 "SMBJ12CA-HT" SMB/DO-214AA 3832.09,1625 r0 top
D10 "SMBJ12CA-HT" SMB/DO-214AA 3832.09,1900 r0 top
D11 "SMBJ12CA-HT" SMB/DO-214AA 4745,1900 r180 top
D12 "SMBJ12CA-HT" SMB/DO-214AA 4745,1625 r180 top
D13 "Sarı" "0805 LED" 4430,2155 r270 top
D14 "Sarı" "0805 LED" 4135.47,2153.58 r270 top
D15 "SMBJ12CA-HT" SMB/DO-214AA 1537.09,1620 r0 top
D16 "SMBJ12CA-HT" SMB/DO-214AA 1540,1900 r0 top
D17 "SMBJ12CA-HT" SMB/DO-214AA 2492.91,1905 r180 top
D18 "SMBJ12CA-HT" SMB/DO-214AA 2487.91,1630 r180 top
D19 "Yeşil" "0805 LED" 2185.47,2153.58 r270 top
D20 "Yeşil" "0805 LED" 1875,2150 r270 top
D21 "SMBJ12CA-HT" SMB/DO-214AA 2685,1610 r0 top
D22 "SMBJ12CA-HT" SMB/DO-214AA 2690,1900 r0 top
D23 "SMBJ12CA-HT" SMB/DO-214AA 3605,1900 r180 top
D24 "SMBJ12CA-HT" SMB/DO-214AA 3600,1615 r180 top
D25 "Yeşil" "0805 LED" 3295.47,2148.58 r270 top
D26 "Yeşil" "0805 LED" 3020.47,2153.58 r270 top
D27 "Kırmızı" "0805 LED" 4630,2755 r180 top
D28 "Kırmızı" "0805 LED" 4630,3140 r180 top
D30 "0805 LED" "0805 LED" 4040,4800 r270 top
D31 "0805 LED" "0805 LED" 4750.47,4798.58 r270 top
D32 "Kırmızı" "0805 LED" 4633.58,3514.53 r180 top
F1 "2A" 1808_Sigorta 1707.09,4540 r0 top
I1 "LNP7850-220K" LPN7850 2510,4980 r0 top value=22uH
IC1 "HCPL-2411" DIP8-2.54 1940,2860 r90 top
IC2 "HCPL-2411" DIP8-2.54 1640,3595 r270 top
P1 "ped" ped 2270,2225 r180 top
P2 "ped" ped 3385,2240 r0 top
P12 "ped" ped 1915,2310 r90 bottom
P13 "ped" ped 1320,2310 r270 bottom
P14 "ped" ped 1630,2305 r270 bottom
P15 "ped" ped 2020,2570 r90 bottom
P16 "ped" ped 2100,2570 r90 bottom
P19 "ped" ped 1640,2570 r270 bottom
P20 "ped" ped 1325,2565 r270 bottom
P21 "ped" ped 2100,2670 r90 bottom
P22 "ped" ped 2020,2670 r90 bottom
P25 "ped" ped 2020,2470 r90 bottom
P26 "ped" ped 2100,2470 r90 bottom
Q1 "IRF9540N" IFX-PG-TO220-3-904-1 2100,4860 r90 top
R1 "2.7K" "0805 Dırenc" 1903.58,4424.53 r180 top
R2 "10K" "0805 Dırenc" 1950.16,4365.47 r0 top
R3 "2.7K" "0805 Dırenc" 1354.53,4001.42 r90 top
R4 "330R" "0805 Dırenc" 1514.53,4000.16 r90 top
R5 "150R" "0805 Dırenc" 1679.53,4000.16 r90 top
R6 "330R" "0805 Dırenc" 1844.53,4001.42 r90 top
R7 "150R" "0805 Dırenc" 2009.53,4001.42 r90 top
R8 "10K" "0805 Dırenc" 3600.47,3409.84 r270 top
R9 "10K" "0805 Dırenc" 3230.47,2688.58 r270 top
R10 "4.7K" "0805 Dırenc" 2999.47,2699.58 r270 top
R11 "4.7K" "0805 Dırenc" 3125.47,2688.58 r270 top
R12 "10K" "0805 Dırenc" 2964.53,3064.84 r270 bottom
R13 "10K" "0805 Dırenc" 2629.53,3518.58 r270 bottom
R14 "10K" "0805 Dırenc" 2848.58,3425.47 r180 bottom
R15 "10K" "0805 Dırenc" 2255.16,2700.47 r0 top
R16 "10K" "0805 Dırenc" 2926.42,3749.53 r0 bottom
R17 "10K" "0805 Dırenc" 2944.53,2600.16 r90 top
R18 "10K" "0805 Dırenc" 2900.47,3140.16 r90 bottom
R19 "10K" "0805 Dırenc" 3104.53,3059.84 r270 bottom
R20 "10K" "0805 Dırenc" 2635.47,3640.16 r90 bottom
R21 "10K" "0805 Dırenc" 3055.47,3356.42 r90 bottom
R22 "10K" "0805 Dırenc" 2750.16,3619.53 r0 bottom
R23 "10K" "0805 Dırenc" 3055.47,3500.16 r90 bottom
R24 "10K" "0805 Dırenc" 3104.53,3234.84 r270 bottom
R25 "10K" "0805 Dırenc" 3479.53,2591.42 r90 top
R26 "10K" "0805 Dırenc" 2501.42,3014.53 r0 bottom
R27 "10K" "0805 Dırenc" 2671.42,3014.53 r0 bottom
R28 "10K" "0805 Dırenc" 2119.16,3669.53 r0 bottom
R29 "1K" "0805 Dırenc" 1806.42,2725.47 r0 top
R30 "120R" "0805 Dırenc" 4618.58,1784.53 r180 top
R31 "120R" "0805 Dırenc" 3970.16,1725.47 r0 top
R32 "600R" "0805 Dırenc" 2078.53,2972.16 r90 top
R33 "22R" "0805 Dırenc" 4459.53,1556.42 r90 top
R34 "22R" "0805 Dırenc" 4379.53,1555.16 r90 top
R35 "22R" "0805 Dırenc" 4294.53,1555.16 r90 top
R36 "22R" "0805 Dırenc" 4209.53,1555.16 r90 top
R37 "470R" "0805 Dırenc" 4379.53,2065.16 r90 top
R38 "470R" "0805 Dırenc" 4249.53,2065.16 r90 top
R39 "1K" "0805 Dırenc" 1831.42,3665.47 r0 top
R40 "600R" "0805 Dırenc" 1549.53,3426.42 r90 top
R41 "22R" "0805 Dırenc" 2359.84,2184.53 r180 top
R42 "10K" "0805 Dırenc" 2358.58,2109.53 r180 top
R43 "22R" "0805 Dırenc" 3474.84,2199.53 r180 top
R44 "120R" "0805 Dırenc" 2354.84,1799.53 r180 top
R45 "120R" "0805 Dırenc" 1676.42,1725.47 r0 top
R46 "10K" "0805 Dırenc" 3473.58,2119.53 r180 top
R47 "22R" "0805 Dırenc" 2199.53,1555.16 r90 top
R48 "120R" "0805 Dırenc" 3463.58,1784.53 r180 top
R49 "120R" "0805 Dırenc" 2826.42,1720.47 r0 top
R50 "22R" "0805 Dırenc" 2109.53,1556.42 r90 top
R51 "22R" "0805 Dırenc" 2019.53,1556.42 r90 top
R52 "22R" "0805 Dırenc" 3334.53,1540.16 r90 top
R53 "22R" "0805 Dırenc" 1924.53,1556.42 r90 top
R54 "22R" "0805 Dırenc" 3244.53,1541.42 r90 top
R55 "470R" "0805 Dırenc" 2124.53,2061.42 r90 top
R56 "470R" "0805 Dırenc" 1989.06,2061.57 r90 top
R57 "22R" "0805 Dırenc" 3154.53,1540.16 r90 top
R58 "22R" "0805 Dırenc" 3064.53,1540.16 r90 top
R59 "470R" "0805 Dırenc" 3239.53,2060.16 r90 top
R60 "470R" "0805 Dırenc" 3139.53,2061.42 r90 top
R61 "600R" "0805 Dırenc" 4783.58,2784.53 r180 top
R62 "330R" "0805 Dırenc" 4320.47,2974.84 r270 top
R63 "10K" "0805 Dırenc" 3235.16,3929.53 r0 bottom
R64 "10K" "0805 Dırenc" 2141.42,3044.53 r0 bottom
R65 "10K" "0805 Dırenc" 2143.16,3336.53 r0 bottom
R68 "600R" "0805 Dırenc" 4789.84,3544.53 r180 top
R69 "330R" "0805 Dırenc" 4379.53,3260.16 r90 top
R70 "600R" "0805 Dırenc" 4779.84,3169.53 r180 top
R71 "330R" "0805 Dırenc" 4379.53,3636.42 r90 top
R73 "4.7K" "0805 Dırenc" 3731.16,3036.47 r0 top
R74 "4.7K" "0805 Dırenc" 3690.84,3095.53 r180 top
R81 "470R" "0805 Dırenc" 3969.53,4351.42 r90 top
R82 "330R" "0805 Dırenc" 3974.53,3866.42 r90 top
R83 "470R" "0805 Dırenc" 4104.53,4351.42 r90 top
R84 "330R" "0805 Dırenc" 4099.53,3866.42 r90 top
R85 "470R" "0805 Dırenc" 4234.53,4350.16 r90 top
R86 "330R" "0805 Dırenc" 4224.53,3866.42 r90 top
R87 "470R" "0805 Dırenc" 4364.53,4351.42 r90 top
R88 "330R" "0805 Dırenc" 4349.53,3866.42 r90 top
R89 "10K" "0805 Dırenc" 3618.98,4546.42 r90 top
R90 "10K" "0805 Dırenc" 3774.53,4546.42 r90 top
R91 "10K" "0805 Dırenc" 3927.95,4546.42 r90 top
R92 "330R" "0805 Dırenc" 3834.53,3860.42 r90 top
R93 "470R" "0805 Dırenc" 4069.53,4550.16 r90 top
R94 "1K" "0805 Dırenc" 4145.47,4644.84 r270 top
R95 "10K" "0805 Dırenc" 4339.53,4546.42 r90 top
R96 "10K" "0805 Dırenc" 4484.53,4546.42 r90 top
R97 "10K" "0805 Dırenc" 4624.53,4546.42 r90 top
R98 "330R" "0805 Dırenc" 4625.53,3889.42 r90 top
R99 "470R" "0805 Dırenc" 4774.53,4531.42 r90 top
R100 "1K" "0805 Dırenc" 4850.47,4628.58 r270 top
R128 "22R" "0805 Dırenc" 2069.84,2320.47 r180 bottom
R129 "22R" "0805 Dırenc" 1479.84,2310.47 r180 bottom
R130 "22R" "0805 Dırenc" 1784.84,2310.47 r180 bottom
R132 "10K" "0805 Dırenc" 2069.84,2240.47 r180 bottom
R133 "10K" "0805 Dırenc" 1478.58,2235.47 r180 bottom
R134 "10K" "0805 Dırenc" 1784.84,2240.47 r180 bottom
R136 "22R" "0805 Dırenc" 1788.58,2570.47 r180 bottom
R138 "22R" "0805 Dırenc" 1478.58,2575.47 r180 bottom
R139 "10K" "0805 Dırenc" 1788.58,2495.47 r180 bottom
R140 "10K" "0805 Dırenc" 1478.58,2500.47 r180 bottom
R142 "22R" "0805 Dırenc" 2800.16,3915.47 r0 top
R143 "22R" "0805 Dırenc" 3990.16,2430.47 r0 top
R145 "22R" "0805 Dırenc" 3069.84,3974.53 r180 top
R146 "22R" "0805 Dırenc" 3990.16,2565.47 r0 top
R147 "4.7K" "0805 Dırenc" 4879.84,2230.47 r180 bottom
R148 "4.7K" "0805 Dırenc" 4883.58,2370.47 r180 bottom
SB1 "Solder_Bridge" Solder_Bridge 2211,3164 r180 bottom
SB2 "Solder_Bridge" Solder_Bridge 3536,2916 r180 top
SB3 "Solder_Bridge" Solder_Bridge 4790,1730 r90 top
SB4 "Solder_Bridge" Solder_Bridge 3773,1745 r0 top
SB5 "Solder_Bridge" Solder_Bridge 2535,1743 r90 top
SB6 "Solder_Bridge" Solder_Bridge 1488,1740 r0 top
SB7 "Solder_Bridge" Solder_Bridge 3640,1728 r90 top
SB8 "Solder_Bridge" Solder_Bridge 2635,1745 r0 top
T1 "Test Noktası" "Test Noktası" 1325,4160 r0 top
T2 "Test Noktası" "Test Noktası" 1485,4160 r0 top
T3 "Test Noktası" "Test Noktası" 1650,4160 r0 top
T4 "Test Noktası" "Test Noktası" 1815,4160 r0 top
T5 "Test Noktası" "Test Noktası" 1980,4160 r0 top
T6 "Test Noktası" "Test Noktası" 2915,2530 r180 top
T7 "Test Noktası" "Test Noktası" 3040,2530 r180 top
T8 "Test Noktası" "Test Noktası" 2050,3200 r90 top
T9 "Test Noktası" "Test Noktası" 1520,3125 r90 top
T10 "Test Noktası" "Test Noktası" 4350,2225 r0 top
T11 "Test Noktası" "Test Noktası" 4220,2225 r0 top
T12 "Test Noktası" "Test Noktası" 1520,3280 r90 top
T13 "Test Noktası" "Test Noktası" 2050,3355 r90 top
T14 "Test Noktası" "Test Noktası" 2095,2220 r90 top
T15 "Test Noktası" "Test Noktası" 1960,2220 r90 top
T16 "Test Noktası" "Test Noktası" 3235,2230 r0 top
T17 "Test Noktası" "Test Noktası" 3080,2230 r0 top
T20 "Test Noktası" "Test Noktası" 3595,4770 r0 top
T21 "Test Noktası" "Test Noktası" 3741.58,4770 r0 top
T22 "Test Noktası" "Test Noktası" 3895,4770 r0 top
T23 "Test Noktası" "Test Noktası" 4304.45,4770 r0 top
T24 "Test Noktası" "Test Noktası" 4455,4770 r0 top
T25 "Test Noktası" "Test Noktası" 4598.42,4770 r0 top
U1 "TDN 5-2411WISM" "Traco 5WISM" 2496.3,4332.52 r180 top
U2 "LD1086DT33TR" DPAK 3109.41,4734.45 r270 top
U3 "LD1086DT33TR" DPAK 2564.41,4975.55 r90 bottom
U4 "STM32H735IGT6" LQFP-176 2810,3315 r180 top
U5 "MAX490ESA+" 8-SOIC 4285,1840 r270 top
U6 "MAX490ESA+" 8-SOIC 2030,1825 r270 top
U7 "MAX490ESA+" 8-SOIC 3150,1825 r270 top
U8 "M24C64-WMN6TP" SOIC127P600X175-8N 3675,2495 r180 top
U9 "PC814" SOIC4 4740,2935 r0 top
U10 "PC814" SOIC4 3700,4329 r90 top
U11 "PC814" SOIC4 4496,4348 r90 top
U12 "PC814" SOIC4 4735,3320 r0 top
U13 "PC814" SOIC4 4735,3695 r0 top
U15 "BMP180" BMP180 3736,2921 r180 top
U17 "IS2801-4" IS2801-4_ISO 4140,4160 r90 top
VD1 "M3" Vida_Deliği 1377.95,4921.26 r0 top
VD2 "M3" Vida_Deliği 4921.26,4921.26 r0 top
VD3 "M3" Vida_Deliği 1377.95,1377.95 r0 top
VD4 "M3" Vida_Deliği 4921.26,1377.95 r0 top
ZD1 "15V" Zener_Diyot 2130,4400 r90 top

## Footprints (in the part's own frame and the unit in brackets; to place one, negate y for a bottom-side part, rotate by r counter-clockwise, add the part's x,y. Pads: shape width x height; smd on the part's side, far side on the other; paste and mask are expansions set on the pad)
2_Pin_JST_Male [mm]
  rect 2x2 hole 0.9 mask+0.05: 1(0,0)
  round 2 hole 0.9 mask+0.05: 2(2.54,0)
  silkscreen extent -2.54,-2.79 5.08,3.56, body extent -2.34,-2.49 4.88,3.35, height 7.21
3_PIN_HEADER [mm]
  oval 1.54x2.54 hole 1 paste-1 mask+0.102: 1(0,0) 2(2.54,0) 3(5.08,0)
  silkscreen extent -1.27,-1.78 6.35,1.78, body extent -1.27,-1.27 6.35,1.23, height 10.54
4_Pin_JST_Male [mm]
  rect 2x2 hole 0.9 mask+0.05: 1(0,0)
  round 2 hole 0.9 mask+0.05: 2(2.54,0) 3(5.08,0) 4(7.62,0)
  silkscreen extent -2.54,-2.79 10.16,3.56, body extent -2.34,-2.49 9.96,3.35, height 7.21
5_Pin_JST_Male [mm]
  rect 2x2 hole 0.9 mask+0.05: 1(0,0)
  round 2 hole 0.9 mask+0.05: 2(2.54,0) 3(5.08,0) 4(7.62,0) 5(10.16,0)
  silkscreen extent -2.54,-2.79 12.7,3.56, body extent -2.34,-2.49 12.5,3.35, height 7.21
5mm_buton [mm]
  rect 1.5x1.3 smd paste-1 mask+0.508: 1(-1.27,0) 2(6.096,0) 3(6.096,-3) 4(-1.27,-3)
  silkscreen extent -2.79,-4.57 7.62,1.52, body extent -1.21,-3.77 6.29,0.73, height 4.2
6_Pin_JST_Male [mm]
  rect 2x2 hole 0.9 mask+0.05: 1(0,0)
  round 2 hole 0.9 mask+0.05: 2(2.54,0) 3(5.08,0) 4(7.62,0) 5(10.16,0) 6(12.7,0)
  silkscreen extent -2.54,-2.79 15.24,3.56, body extent -2.34,-2.54 15.04,3.3, height 7.21
8-SOIC [mm]
  rect 1.5x0.8 smd paste-1 mask+0.2: 1(-2.724,1.905) 2(-2.724,0.635) 3(-2.724,-0.635) 4(-2.724,-1.905) 5(2.724,-1.905) 6(2.724,-0.635) 7(2.724,0.635) 8(2.724,1.905)
  silkscreen extent -3.05,-2.63 2.12,3.17, body extent -3.1,-2.5 3.1,2.5, height 1.76
"0805 Dırenc" [mm]
  rect 0.6x1.2 smd paste-1 mask+0.102: 1(0.25,0.75) 2(2.25,0.75)
  silkscreen extent -0.38,-0.13 2.88,1.63, body extent 0.19,0.13 2.19,1.38, height 0.43
"0805 Kapasıtor" [mm]
  rect 0.5x1 smd paste-1 mask+0.102: 1(0,0) 2(2,0)
  silkscreen extent -0.63,-0.87 2.63,0.88, body extent 0.01,-0.62 2.01,0.63, height 0.61
"0805 LED" [mm]
  rect 0.6x1.2 smd paste-1 mask+0.102: 1(-0.004,-0.012) 2(1.996,-0.012)
  silkscreen extent -0.76,-0.89 2.62,1.02, body extent -0.03,-0.67 2.07,0.67, height 0.9
1206_Kapasitör [mm]
  rect 1x2 smd mask+0.05: 1(0.5,0) 2(3.625,0)
  silkscreen extent -0.5,-1.5 4.75,1.5, body extent 0.37,-0.93 3.57,0.87, height 1.5
1808_Sigorta [mm]
  rect 2.5x3 smd mask+0.05: 1(0,0) 2(4.9,0)
  silkscreen extent -1.91,-2.16 6.86,2.03, body extent -0.64,-1.27 5.46,1.27, height 2.58
BMP180 [mm]
  rect 0.6x1.5 smd: 1(1.5,1.45) 2(0,1.45) 3(-1.5,1.45) 4(-1.5,-1.45) 5(0,-1.45) 6(1.5,-1.45)
  rect 1.5x0.5 smd: 7(1.5,0)
  silkscreen extent -2.03,-2.54 2.54,2.54, body extent -1.9,-1.8 1.9,1.8, height 1
CAP_Elec [mm]
  round 2.5 hole 1 paste-1 mask+0.508: 1(-2.794,0.127) 2(3.048,0.127)
  silkscreen extent -4.87,-4.87 5.13,5.13, body extent -5.12,-5.08 5.37,5.42, height 17.16
DIP8-2.54 [mm]
  rect 2x2 hole 0.9: 1(0,0)
  round 2 hole 0.9: 2(2.54,0) 3(5.08,0) 4(7.62,0) 5(7.62,7.62) 6(5.08,7.62) 7(2.54,7.62) 8(0,7.62)
  silkscreen extent -1.52,-1.52 9.14,9.14, body extent -1.07,0 8.69,7.62, height 4.96
DPAK [mm]
  rrect50% 1.5x2.8 smd paste-1 mask+0.508: 1(0,0) 2(-4.572,0)
  rrect50% 6.3x6.1 smd paste-1 mask+0.508: 3(-2.3,7)
  silkscreen extent -6.6,-2.29 2.03,10.92, body extent -5.55,-0.76 0.95,8.96, height 2.4
IFX-PG-TO220-3-904-1 [mm] "TO,flange mount,2.54 mm pitch, 3 pin, 10.16 mm L X 4.57 mm W X 20.56 mm H body"
  rect 1.99x1.99 hole 1.39 paste+0 mask+0: 1(-2.54,0)
  round 1.99 hole 1.39 paste+0 mask+0: 2(0,0) 3(2.54,0)
  silkscreen extent -5.87,-1.8 5.1,2.9, body extent -5.16,-1.72 5.16,2.86, height 19.84
IS2801-4_ISO [mil]
  rect 70x30 smd paste+0 mask+10: 1(-124,175) 2(-124,125) 3(-124,75) 4(-124,25) 5(-124,-25) 6(-124,-75) 7(-124,-125) 8(-124,-175) 9(124,-175) 10(124,-125) 11(124,-75) 12(124,-25) 13(124,25) 14(124,75) 15(124,125) 16(124,175)
  silkscreen extent -135,-220 96,225, body extent -141,-209 141,209, height 95
LPN7850 [mm]
  rect 8.2x3.5 smd paste-1 mask+0.102: 1(0,0) 2(0,-4.7)
  silkscreen extent -4.44,-6.86 4.44,2.03, body extent -3.7,-6.15 3.7,1.32, height 5
LQFP-176 [mm]
  rrect18% 1.47x0.28 smd: 1(-12.67,10.75) 2(-12.67,10.25) 3(-12.67,9.75) 4(-12.67,9.25) 5(-12.67,8.75) 6(-12.67,8.25) 7(-12.67,7.75) 8(-12.67,7.25) 9(-12.67,6.75) 10(-12.67,6.25) 11(-12.67,5.75) 12(-12.67,5.25) 13(-12.67,4.75) 14(-12.67,4.25) 15(-12.67,3.75) 16(-12.67,3.25) 17(-12.67,2.75) 18(-12.67,2.25) 19(-12.67,1.75) 20(-12.67,1.25) 21(-12.67,0.75) 22(-12.67,0.25) 23(-12.67,-0.25) 24(-12.67,-0.75) 25(-12.67,-1.25) 26(-12.67,-1.75) 27(-12.67,-2.25) 28(-12.67,-2.75) 29(-12.67,-3.25) 30(-12.67,-3.75) 31(-12.67,-4.25) 32(-12.67,-4.75) 33(-12.67,-5.25) 34(-12.67,-5.75) 35(-12.67,-6.25) 36(-12.67,-6.75) 37(-12.67,-7.25) 38(-12.67,-7.75) 39(-12.67,-8.25) 40(-12.67,-8.75) 41(-12.67,-9.25) 42(-12.67,-9.75) 43(-12.67,-10.25) 44(-12.67,-10.75) 89(12.67,-10.75) 90(12.67,-10.25) 91(12.67,-9.75) 92(12.67,-9.25) 93(12.67,-8.75) 94(12.67,-8.25) 95(12.67,-7.75) 96(12.67,-7.25) 97(12.67,-6.75) 98(12.67,-6.25) 99(12.67,-5.75) 100(12.67,-5.25) 101(12.67,-4.75) 102(12.67,-4.25) 103(12.67,-3.75) 104(12.67,-3.25) 105(12.67,-2.75) 106(12.67,-2.25) 107(12.67,-1.75) 108(12.67,-1.25) 109(12.67,-0.75) 110(12.67,-0.25) 111(12.67,0.25) 112(12.67,0.75) 113(12.67,1.25) 114(12.67,1.75) 115(12.67,2.25) 116(12.67,2.75) 117(12.67,3.25) 118(12.67,3.75) 119(12.67,4.25) 120(12.67,4.75) 121(12.67,5.25) 122(12.67,5.75) 123(12.67,6.25) 124(12.67,6.75) 125(12.67,7.25) 126(12.67,7.75) 127(12.67,8.25) 128(12.67,8.75) 129(12.67,9.25) 130(12.67,9.75) 131(12.67,10.25) 132(12.67,10.75)
  rrect18% 0.28x1.47 smd: 45(-10.75,-12.67) 46(-10.25,-12.67) 47(-9.75,-12.67) 48(-9.25,-12.67) 49(-8.75,-12.67) 50(-8.25,-12.67) 51(-7.75,-12.67) 52(-7.25,-12.67) 53(-6.75,-12.67) 54(-6.25,-12.67) 55(-5.75,-12.67) 56(-5.25,-12.67) 57(-4.75,-12.67) 58(-4.25,-12.67) 59(-3.75,-12.67) 60(-3.25,-12.67) 61(-2.75,-12.67) 62(-2.25,-12.67) 63(-1.75,-12.67) 64(-1.25,-12.67) 65(-0.75,-12.67) 66(-0.25,-12.67) 67(0.25,-12.67) 68(0.75,-12.67) 69(1.25,-12.67) 70(1.75,-12.67) 71(2.25,-12.67) 72(2.75,-12.67) 73(3.25,-12.67) 74(3.75,-12.67) 75(4.25,-12.67) 76(4.75,-12.67) 77(5.25,-12.67) 78(5.75,-12.67) 79(6.25,-12.67) 80(6.75,-12.67) 81(7.25,-12.67) 82(7.75,-12.67) 83(8.25,-12.67) 84(8.75,-12.67) 85(9.25,-12.67) 86(9.75,-12.67) 87(10.25,-12.67) 88(10.75,-12.67) 133(10.75,12.67) 134(10.25,12.67) 135(9.75,12.67) 136(9.25,12.67) 137(8.75,12.67) 138(8.25,12.67) 139(7.75,12.67) 140(7.25,12.67) 141(6.75,12.67) 142(6.25,12.67) 143(5.75,12.67) 144(5.25,12.67) 145(4.75,12.67) 146(4.25,12.67) 147(3.75,12.67) 148(3.25,12.67) 149(2.75,12.67) 150(2.25,12.67) 151(1.75,12.67) 152(1.25,12.67) 153(0.75,12.67) 154(0.25,12.67) 155(-0.25,12.67) 156(-0.75,12.67) 157(-1.25,12.67) 158(-1.75,12.67) 159(-2.25,12.67) 160(-2.75,12.67) 161(-3.25,12.67) 162(-3.75,12.67) 163(-4.25,12.67) 164(-4.75,12.67) 165(-5.25,12.67) 166(-5.75,12.67) 167(-6.25,12.67) 168(-6.75,12.67) 169(-7.25,12.67) 170(-7.75,12.67) 171(-8.25,12.67) 172(-8.75,12.67) 173(-9.25,12.67) 174(-9.75,12.67) 175(-10.25,12.67) 176(-10.75,12.67)
  silkscreen extent -14.44,-13.65 13.65,13.65, body extent -13,-13 13,13, height 1.6
MP1584 [mil]
  round 78.74 smd paste-39.37 mask+20: 1(-365,260) 2(-365,160) 3(-365,-160) 4(-365,-260) 5(365,260) 6(365,160) 7(365,-160) 8(365,-260)
  silkscreen extent -437,-327 443,344, body extent -432,-322 438,340, height 161
ped [mm]
  rrect50% 1.4x1.2 smd paste-1 mask+0.102: 1(0,0)
RH100 [mm]
  rect 1.3x1.1 smd paste-1 mask+0.508: 1(0,0) 2(2.3,0) 3(2.3,-1.9) 4(0,-1.9)
  silkscreen extent -1.27,-3.05 3.56,1.02, body extent -0.46,-2.27 2.74,0.23, height 0.66
RT2012 [mm]
  rect 0.7x1.4 smd paste-1 mask+0.102: 1(-0.127,0) 2(1.651,0)
  silkscreen extent -0.64,-0.89 2.16,0.89, body extent -0.06,-0.53 1.59,0.53, height 0.5
SMB/DO-214AA [mm]
  rect 2.16x2.26 smd paste-1 mask+0.102: 1(0,0) 2(4.9,0)
  silkscreen extent -1.4,-2.16 6.35,2.16, body extent -0.34,-1.95 5.16,1.95, height 2.45
SOIC4 [mm]
  rect 2x1.5 smd paste+0 mask+0.127: 1(-7.493,0) 2(-7.493,-2.54) 3(0.762,-2.413) 4(0.762,0)
  silkscreen extent -5.85,-3.3 -1,1.4, body extent -8.1,-3.44 1.5,1.16, height 3.5
SOIC127P600X175-8N [mil]
  rect 56x29.53 smd: 1(-110,75) 2(-110,25) 3(-110,-25) 4(-110,-75) 5(110,-75) 6(110,-25) 7(110,25) 8(110,75)
  silkscreen extent -78,-101 78,101, body extent -116,-96 120,96, height 69
Solder_Bridge [mil]
  rect 10x10 smd paste-39.37 mask+0: 1(5,10) 2(42,10)
  SIG_1/POW region: 0,0 0,20 15,20 15,0
  SIG_1/POW region: 15,0 15,10 25,10
  SIG_1/POW region: 25,10 15,20 15,10
  SIG_1/POW region: 27,0 47,0 47,20 27,20 37,10
  silkscreen extent -5,-5 52,25
"Test Noktası" [mm]
  rrect50% 1.5x1.5 smd paste-1 mask+0.102: 1(0,0)
  silkscreen extent -1.02,-1.02 1.02,1.02
"Traco 5WISM" [mm]
  rect 6x1.4 smd paste-1 mask+0.102: 1(0,0) 2(0,-2) 4(0,-6) 5(-10,0) 6(-10,-2) 7(-10,-4)
  silkscreen extent -13.81,-7.62 4.06,1.78, body extent -12.17,-7.47 2.03,1.63, height 10.08
Vida_Deliği [mm]
  round 6 hole 3 mask+0.05: 1(0,0)
XT30 [mm]
  oval 6x4 hole 3 paste-1 mask+0.508: 1(0,2.794) 2(0,-2.794)
  silkscreen extent -3.3,-5.59 5.08,5.71, body extent -3.07,-5.43 3.03,5.57, height 12.9
Zener_Diyot [mm]
  rect 1x1.5 smd paste-1 mask+0.102: 1(-0.254,0) 2(3.302,0)
  silkscreen extent -1.04,-1.07 4.11,1.07, body extent -0.33,-0.8 3.37,0.8, height 1.63

## Part data
C2 C3 C4 C9: library part "1206 CAP"
C5 C6 C7 C8 C10 C11 C12 C13 C15 C16 C18 C19 C20 C21 C22 C23 C24 C25 C26 C27 C28 C29 C30 C31 C32 C33 C34 C35 C36 C37 C38 C39 C40 C41 C42 C43 C44 C45 C46 C47 C48 C49 C50 C51 C52 C53 C54 C55 C58 C59 C60 C61 C64 C65 C68 C69: library part "Kapasitor 0805"
CARD1: library part MP1584EN_kartı
CN2: library part 3_Pin_2.54mm
CR1: library part 16_MHz_Crystal
CR2: library part RT2012_Kristal
D1 D2 D3 D4 D5 D6 D13 D14 D19 D20 D25 D26 D27 D28 D32: library part "0805 LED"
F1: library part 1808_Sigorta
Q1: "OptiMOS - P2 Power-Transistor, P-channel-Enhancement mode, VDS -30V", Manufacturer="Infineon Technologies", Manufacturer Order NumberManufacturer Order Number=IRF9540N, PackageReference=PG-TO220-3-904
R1 R2 R3 R4 R5 R6 R7 R8 R9 R10 R11 R12 R13 R14 R15 R16 R17 R18 R19 R20 R21 R22 R23 R24 R25 R26 R27 R28 R29 R30 R31 R32 R33 R34 R35 R36 R37 R38 R39 R40 R41 R42 R43 R44 R45 R46 R47 R48 R49 R50 R51 R52 R53 R54 R55 R56 R57 R58 R59 R60 R61 R62 R63 R64 R65 R68 R69 R70 R71 R73 R74 R81 R82 R83 R84 R85 R86 R87 R88 R89 R90 R91 R92 R93 R94 R95 R96 R97 R98 R99 R100 R128 R129 R130 R132 R133 R134 R136 R138 R139 R140 R142 R143 R145 R146 R147 R148: library part "Direnc 0805"
SB1 SB2 SB3 SB4 SB5 SB6 SB7 SB8: library part "Lehim Köprüsü"
U4: "ARM® Cortex®-M7 STM32H7 Microcontroller IC 32-Bit 550MHz 1MB (1M x 8) FLASH 176-LQFP (24x24)", Package="LQFP-176 STMicroelectronics", Check_prices=https://www.snapeda.com/parts/STM32H735IGT6/STMicroelectronics/view-part/?ref=eda, MF=STMicroelectronics, MP=STM32H735IGT6, SnapEDA_Link=https://www.snapeda.com/parts/STM32H735IGT6/STMicroelectronics/view-part/?ref=snap
U5 U6 U7: "Low-Power, Slew-Rate-Limited RS-485/RS-422 Transceivers", Manufacturer_Name="Analog Devices Inc", Copyright="Copyright (C) 2026 Ultra Librarian. All rights reserved.", Manufacturer_Part_Number=MAX490ESA+, RefDes=RefDes, Type=Type
U8: Package=None, Availability=Unavailable, MP=M24C64-WMN6TP, Price=None
U9 U10 U11 U12 U13: "Description", Manufacturer_Name=Isocom, Manufacturer_Part_Number=IS2801-1, Copyright="Copyright (C) 2026 Ultra Librarian. All rights reserved.", RefDes=RefDes, Type=Optoisolators
U17: "Description", Manufacturer_Name=Isocom, Copyright="Copyright (C) 2025 Ultra Librarian. All rights reserved.", Manufacturer_Part_Number=IS2801-4, RefDes=RefDes, Type=Type
VD1 VD2 VD3 VD4: library part Vida_Deliği
ZD1: library part BZV55C18

## Via types
v1: diameter 24, hole 12, SIG_1/POW to SIG_2/GND, tented both sides, 358 vias

## Nets (pads, with @x,y where several pads share a name; then routed paths per layer and width w, separated by ;. In a path a pad name is that pad's centre, name@x,y a point inside that pad or via, vN(x,y) a via of type N, cw(c..) or ccw(c..) an arc to the next point about the centre after c; other vN are vias at no path point)
+3.3V: C12.2 C13.2 R5.2 T3.1 U3.3 | length 1800.9
  SIG_1/POW w8: R5.2@1650,4088.74 T3.1@1650,4156
  SIG_1/POW w12: T3.1@1650,4160 1650,4156 v1(1729,4156)
  SIG_2/GND w12: v1(1729,4156) 1774,4156 1791,4173 1791,4349 1812,4370 1836,4394 2594,4394 2618,4370 2871,4370 2871,4667
+3.3V_I: C7.2 C8.2 C20.2 C21.2 C22.2 C23.2 C24.2 C32.2 C33.2 C34.2 C35.2 C36.2 C37.2 C38.2 C39.2 C40.2 C41.2 C42.2 C43.2 C44.2 C45.2 C46.2 C47.2 C48.2 C49.2 C50.2 C51.2 C52.2 C53.2 C54.2 C55.2 C64.2 C65.2 CN2.1 CN3.1 P21.1 P22.1 R7.2 R8.2 R10.2 R11.2 R25.1 R73.2 R74.2 R147.2 R148.2 SB1.1 SB2.1 T5.1 U2.3 U4.7 U4.13 U4.25 U4.39 U4.40 U4.44 U4.48 U4.65 U4.71 U4.82 U4.84 U4.92 U4.99 U4.105 U4.113 U4.126 U4.135 U4.136 U4.152 U4.160 U4.175 U4.176 U15.2 U15.3 | length 4771.5
  SIG_1/POW w8: v1(2228,3423) 2228.13,3423.13 2311.05,3423.13 U4.105@2311.18,3423.27 ; v1(2236,2954) 2236.06,2954.06 2236.06,2971.88 2273.89,3009.71 2311.01,3009.71 U4.126@2311.18,3009.88 ; v1(2241,3240) 2266.79,3265.79 U4.113@2311.18,3265.79 ; U4.99@2311.18,3541.38 2357.68,3541.38 2373.3,3557 v1(2376,3557) ; U4.92@2311.18,3679.17 2366.17,3679.17 2381,3694 v1(2381,3730) ; U4.135@2426.14,2816.18 2426.14,2766.86 v1(2437,2756) 2442.14,2761.14 2442.14,2761.31 2445.83,2765 U4.136@2445.83,2816.18 ; U4.84@2465.51,3813.82 2465.51,3871.18 2476,3881.67 v1(2476,3886) 2504.88,3857.12 U4.82@2504.88,3813.82 ; U4.71@2721.42,3813.82 2721.59,3813.99 v1(2721.59,3876.59) ; v1(2760,2754) 2760.79,2754.79 U4.152@2760.79,2816.18 ; U4.65@2839.53,3813.82 2839.7,3813.65 2839.7,3664.3 v1(2840,3664) ; U4.160@2918.27,2816.18 2918.27,2872.27 v1(2940,2894) ; R10.2@3029,2611 3040.81,2611 3067.81,2638 v1(3075,2638) ; R11.2@3155,2600 3166.81,2600 v1(3197,2630.19) ; U4.48@3174.17,3813.82 3174.17,3854.76 3181.36,3861.94 3191.94,3861.94 v1(3195,3865) ; C7.2@3175,5040 v1(3226,5040) ; U4.175@3213.54,2816.18 3213.54,2860.54 3219,2866 3253,2866 v1(3255,2864) 3257.27,2861.73 3257.27,2820.87 3252.58,2816.18 U4.176@3233.23,2816.18 ; v1(3223,3089) 3261.99,3127.99 U4.13@3308.82,3127.99 ; v1(3228,3687) 3246.63,3668.37 3246.63,3661.87 ; v1(3229,3396) 3260.79,3364.21 U4.25@3308.82,3364.21 ; U4.7@3308.82,3009.88 3366.12,3009.88 3387,2989 v1(3387,2988) ; U4.39@3308.82,3639.8 3262.2,3639.8 3246.63,3655.37 3246.63,3661.87 ; U4.40@3308.82,3659.49 3249.01,3659.49 3246.63,3661.87 ; U4.44@3308.82,3738.23 v1(3308.82,3770.18) ; v1(3400,2599) 3401.13,2600.13 3448.87,2600.13 R25.1@3450,2601.26 ; C8.2@3413.74,5040 3414.74,5041 v1(3470,5041) ; v1(3510,2800) 3510,2844.16 3531,2865.16 SB2.1@3531,2906 ; v1(3566,3063) 3599.26,3063 R74.2@3602.26,3066 ; v1(3629,3284) 3629,3320.26 R8.2@3630,3321.26 ; v1(3706,2784) 3736,2814 U15.2@3736,2863.91 ; U15.3@3795.06,2863.91 3795.06,2817.94 3832,2781 v1(3836,2781) ; R73.2@3819.74,3066 3849.67,3066 3863.67,3052 v1(3868,3052) ; C65.2@3866,2939.74 v1(3866,2987) ; v1(3934,2992) 3946,2980 C64.2@3946,2941
  SIG_1/POW w12: T5.1@1980,4160 R7.2@1980,4090 2091,4090 2116,4065 2116,3926 v1(2115,3925)
  SIG_2/GND w8: SB1.1@2206,3174 2206,3205 v1(2241,3240) ; v1(2381,3730) 2381,3699.58 2386.84,3693.74 C39.2@2395,3693.74 ; C42.2@2390,3011.26 2390.37,3011.63 2440.63,3011.63 v1(2441,3012) ; C43.2@2390,3265 2391,3266 2435,3266 v1(2436,3267) ; C40.2@2395,3426.26 2404.84,3426.26 2437,3458.42 v1(2437,3460) ; v1(2437,2756) 2441.33,2756 2451.64,2745.69 2469.16,2745.69 2475,2739.84 C47.2@2475,2730 ; v1(2449,2944) 2449.5,2943.5 2449.5,2895.5 C44.2@2450,2895 ; C41.2@2465,3425 2474.84,3425 2504,3454.16 v1(2504,3456) ; C54.2@2473.74,2655 2474.74,2656 v1(2523,2656) ; C38.2@2478.26,3719 v1(2512,3719) ; v1(2509,2937) 2509.5,2936.5 2509.5,2895.5 C45.2@2510,2895 ; v1(2760,2754) C46.2@2760,2895 ; C37.2@2838.74,3720 2839.37,3719.37 2839.37,3664.63 v1(2840,3664) ; C52.2@2908.74,2895 2909.74,2894 v1(2940,2894) ; v1(3121,2969) 3143.74,2946.26 C49.2@3143.74,2895 ; C36.2@3165,3720 3170.16,3714.84 3182.16,3714.84 3209.03,3687.97 3227.03,3687.97 v1(3228,3687) 3228,3726.74 C35.2@3230,3728.74 ; v1(3198,3490) 3198.9,3490 3220.16,3511.26 C24.2@3230,3511.26 ; v1(3223,3089) 3223,3052 C32.2@3225,3050 ; C33.2@3225,3150 v1(3225,3185) ; v1(3229,3396) 3229,3366 C34.2@3230,3365 ; v1@3252.31,2861.31 v1(3255,2864) 3256.73,2862.27 3284.05,2862.27 3288.74,2866.96 C48.2@3288.74,2895 ; C53.2@3385,2800 v1(3426,2800) ; v1(3423,3755) C21.2@3460,3755 ; v1(3425,3680) C20.2@3458.74,3680 ; C22.2@3460,3830 3460,3839.84 3431.84,3868 v1(3430,3868) 3432.84,3868 3460,3895.16 C23.2@3460,3905 ; C55.2@3470,2800 v1(3510,2800) ; v1(4755,2404) 4791,2404 R148.2@4795,2400 ; v1(4791,2307) 4791,2260 R147.2@4791.26,2260
  SIG_2/GND w12: v1(2476,3886) 2476.31,3886.31 2506.16,3886.31 2510,3890.16 C50.2@2510,3900 ; v1(2477,3937) 2479.3,3939.3 2482.88,3939.3 2508.74,3965.16 C51.2@2508.74,3975
  SIG_2/GND w30: P22.1@2020,2670 P21.1@2100,2670 v1(2100,2720)
  other v1: 3478,4556 3282,4559 3353,4559 3414,4559 3363,4640 3285,4641 3431,4642 3485,4645 3287,4967 3476,4968
+5V: C10.2 C11.2 C16.2 C68.2 C69.2 CARD1.7 CARD1.8 CN4.1 CN8.1 CN14.1 CN16.1 IC1.8 R4.2 R81.2 R83.2 R85.2 R87.2 T2.1 U3.1 U9.4 U10.4 U11.4 U12.4 U13.4 | length 783
  SIG_1/POW w8: R4.2@1485,4088.74 T2.1@1485,4160 ; U10.4@3700,4359 3717,4376 v1(3717,4436) ; C69.2@3874,4182.26 3918.26,4182.26 v1(3921,4185) ; v1(3879,4439) 3879.5,4439.5 3939.5,4439.5 R81.2@3940,4440 ; v1(4014,4442) 4015,4441 4074,4441 R83.2@4075,4440 ; v1(4143,4440) 4143.63,4439.37 4204.37,4439.37 R85.2@4205,4438.74 ; v1(4282,4440) R87.2@4335,4440 ; C68.2@4402,4272.74 4411.84,4272.74 4417.69,4278.58 4417.69,4307.69 v1(4418,4308) ; v1(4434,4383) 4491,4383 U11.4@4496,4378 ; v1(4756,3770) 4756,3704 U13.4@4765,3695 ; v1(4759,3393) 4759,3326 U12.4@4765,3320 ; v1(4768,3009) 4768,2937 U9.4@4770,2935
  other v1: 1533.92,4158.99 2281,4230 2280,4273 2385,4470 2423,4471 2423,4517 2386,4518